# Altium PCB stm_steppers.PcbDoc (part 1 of 2)
Units mil, origin at the board's own origin, x right, y up, seen from the top; angles counter-clockwise.
Board outline 6000 x 4000 mil, 6 copper layers (L1, L2, L3, L4, L5, L6), stack 60.556 mil thick; 99 components, 127 nets, 625 pads, 390 vias.
Unrouted connection lines stored in the file: 29.
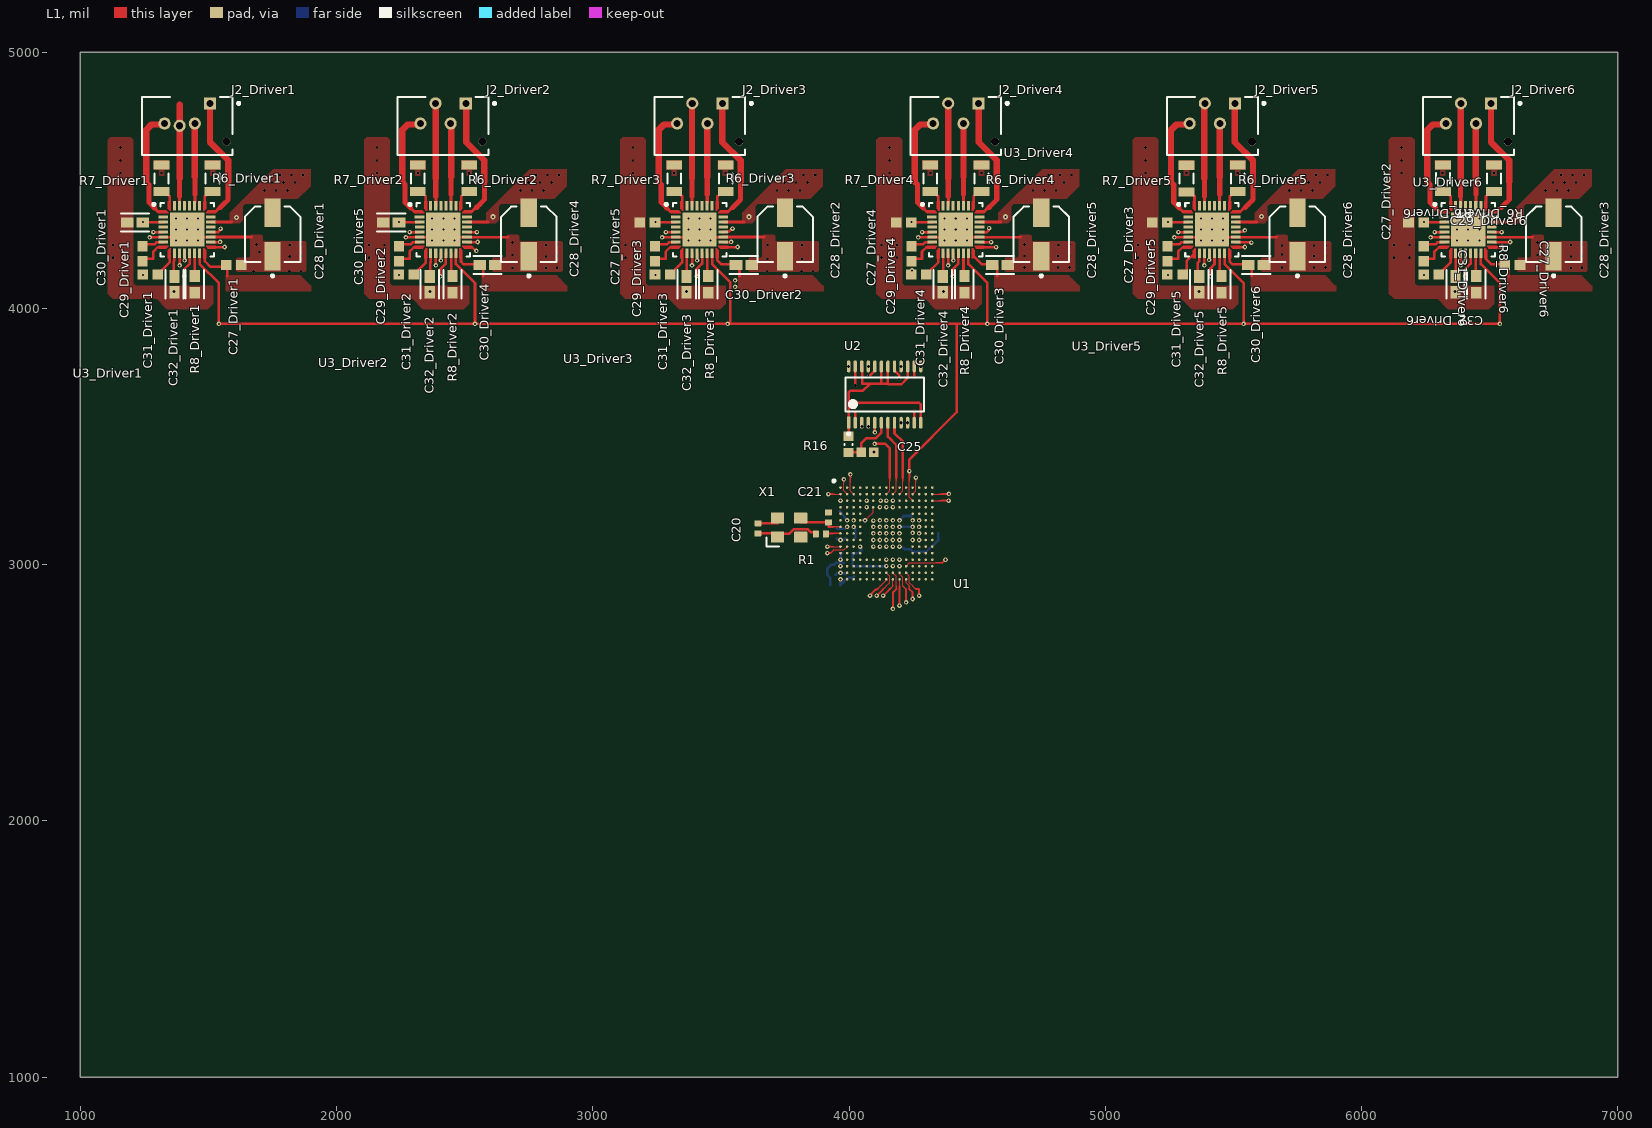
[diagram p0: L1 view]
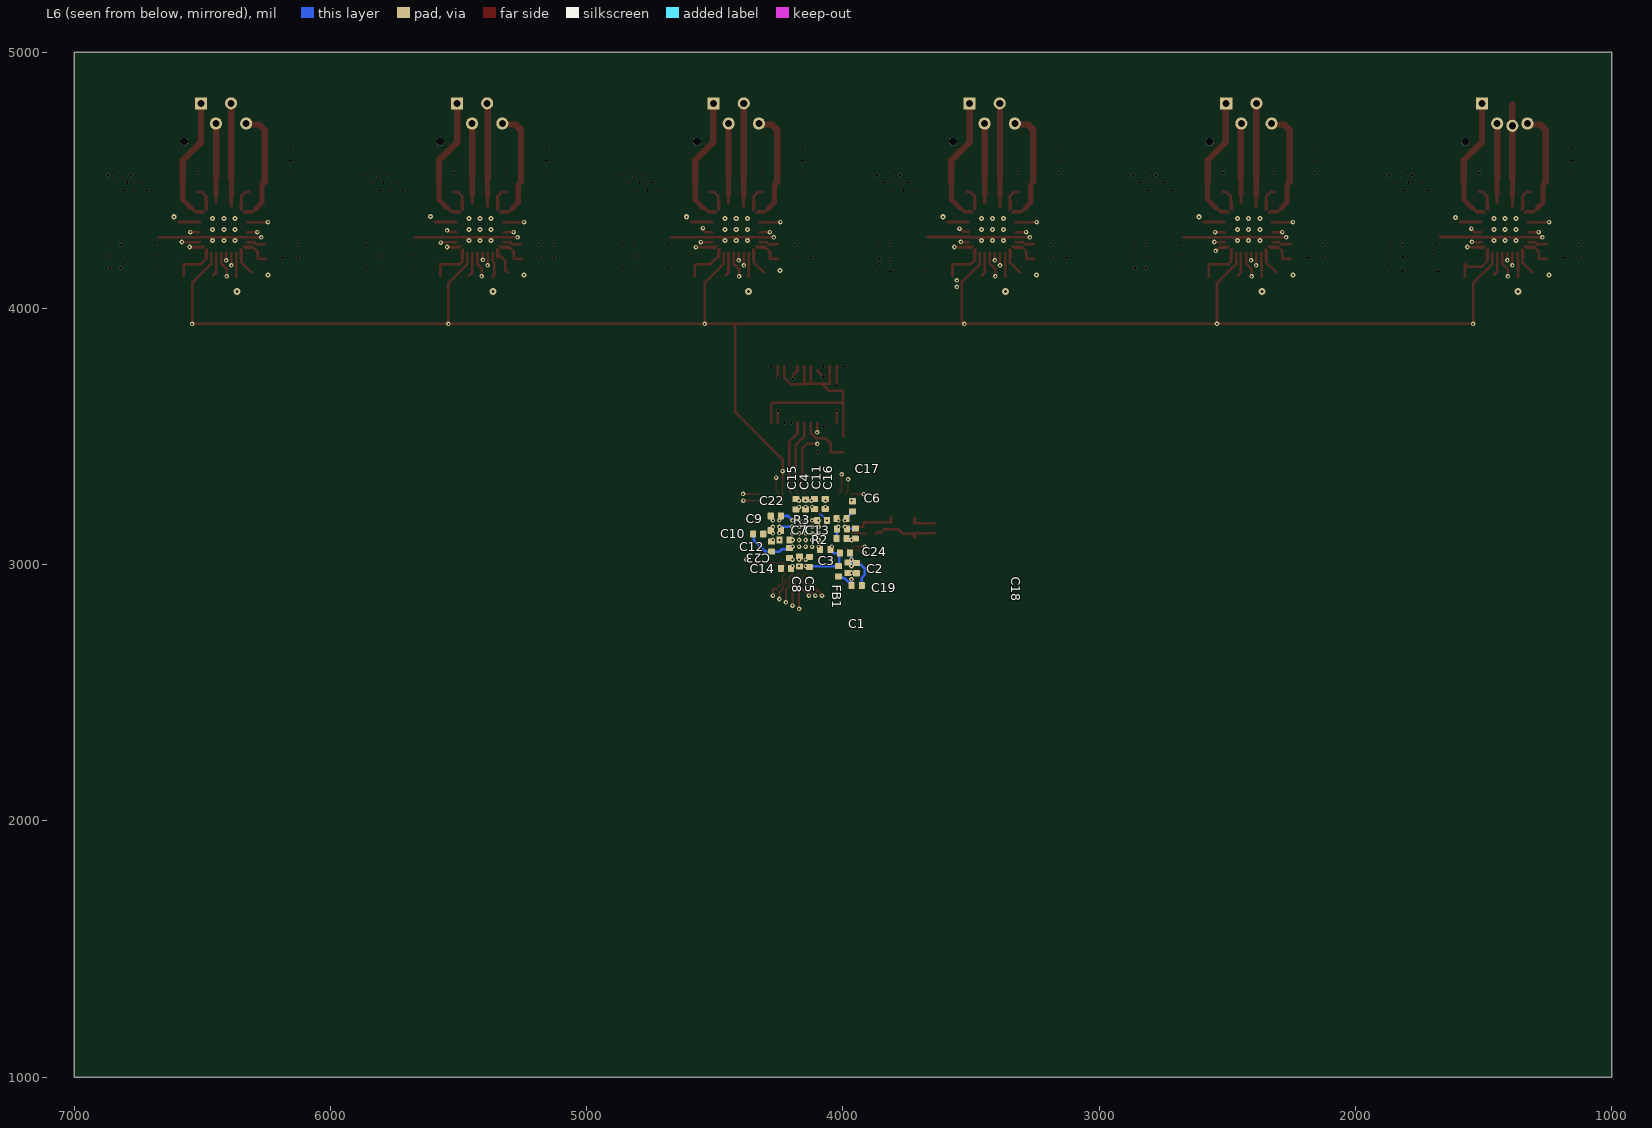
[diagram p1: L6 view, seen from below]
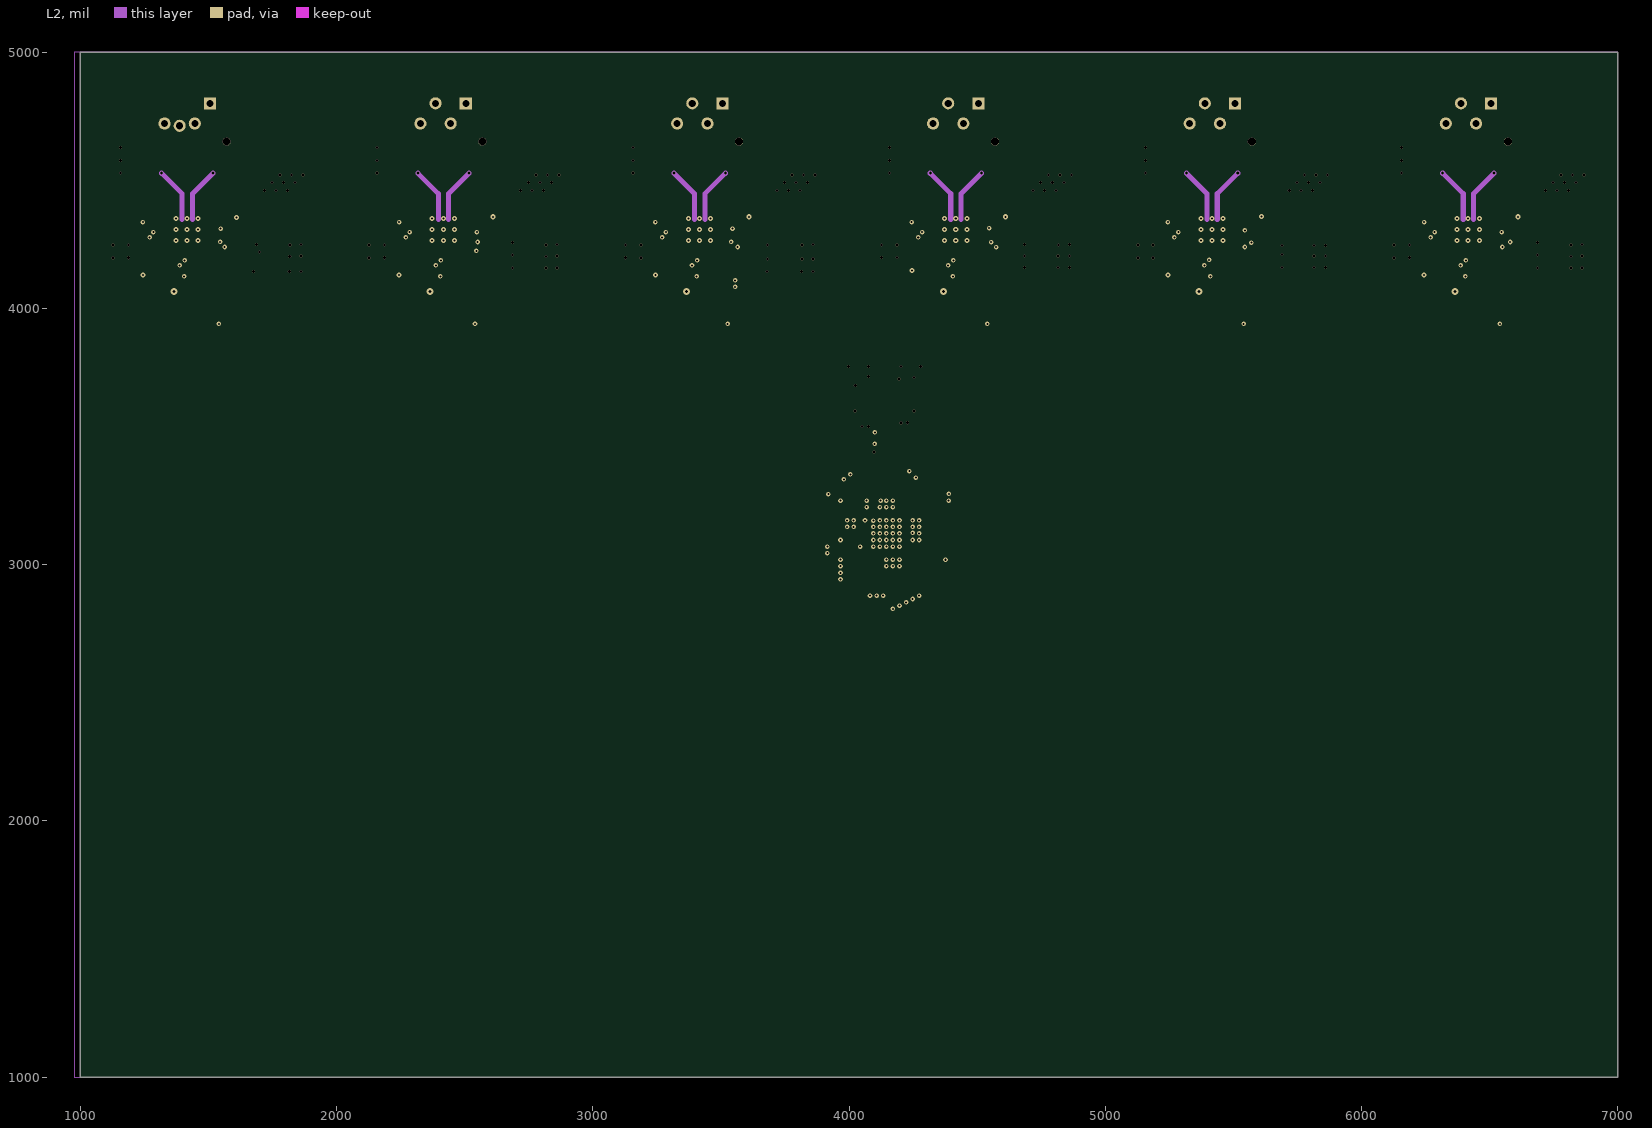
[diagram p2: L2]
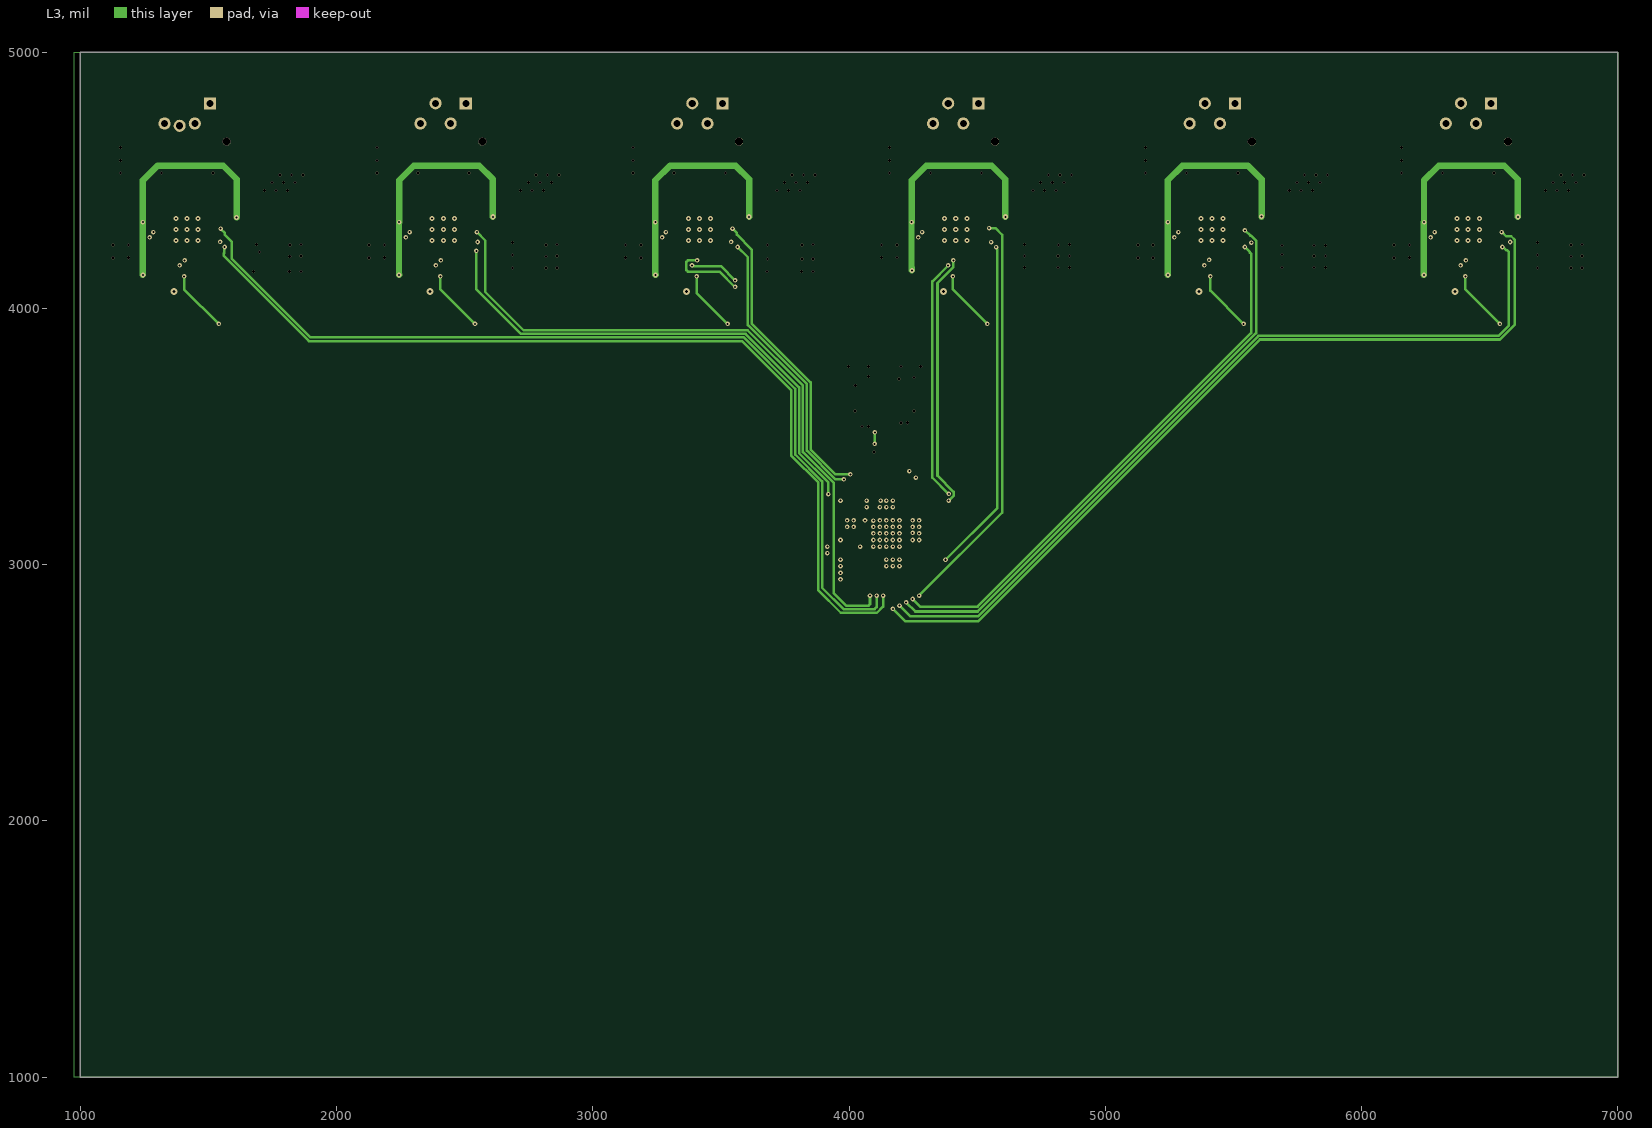
[diagram p3: L3]
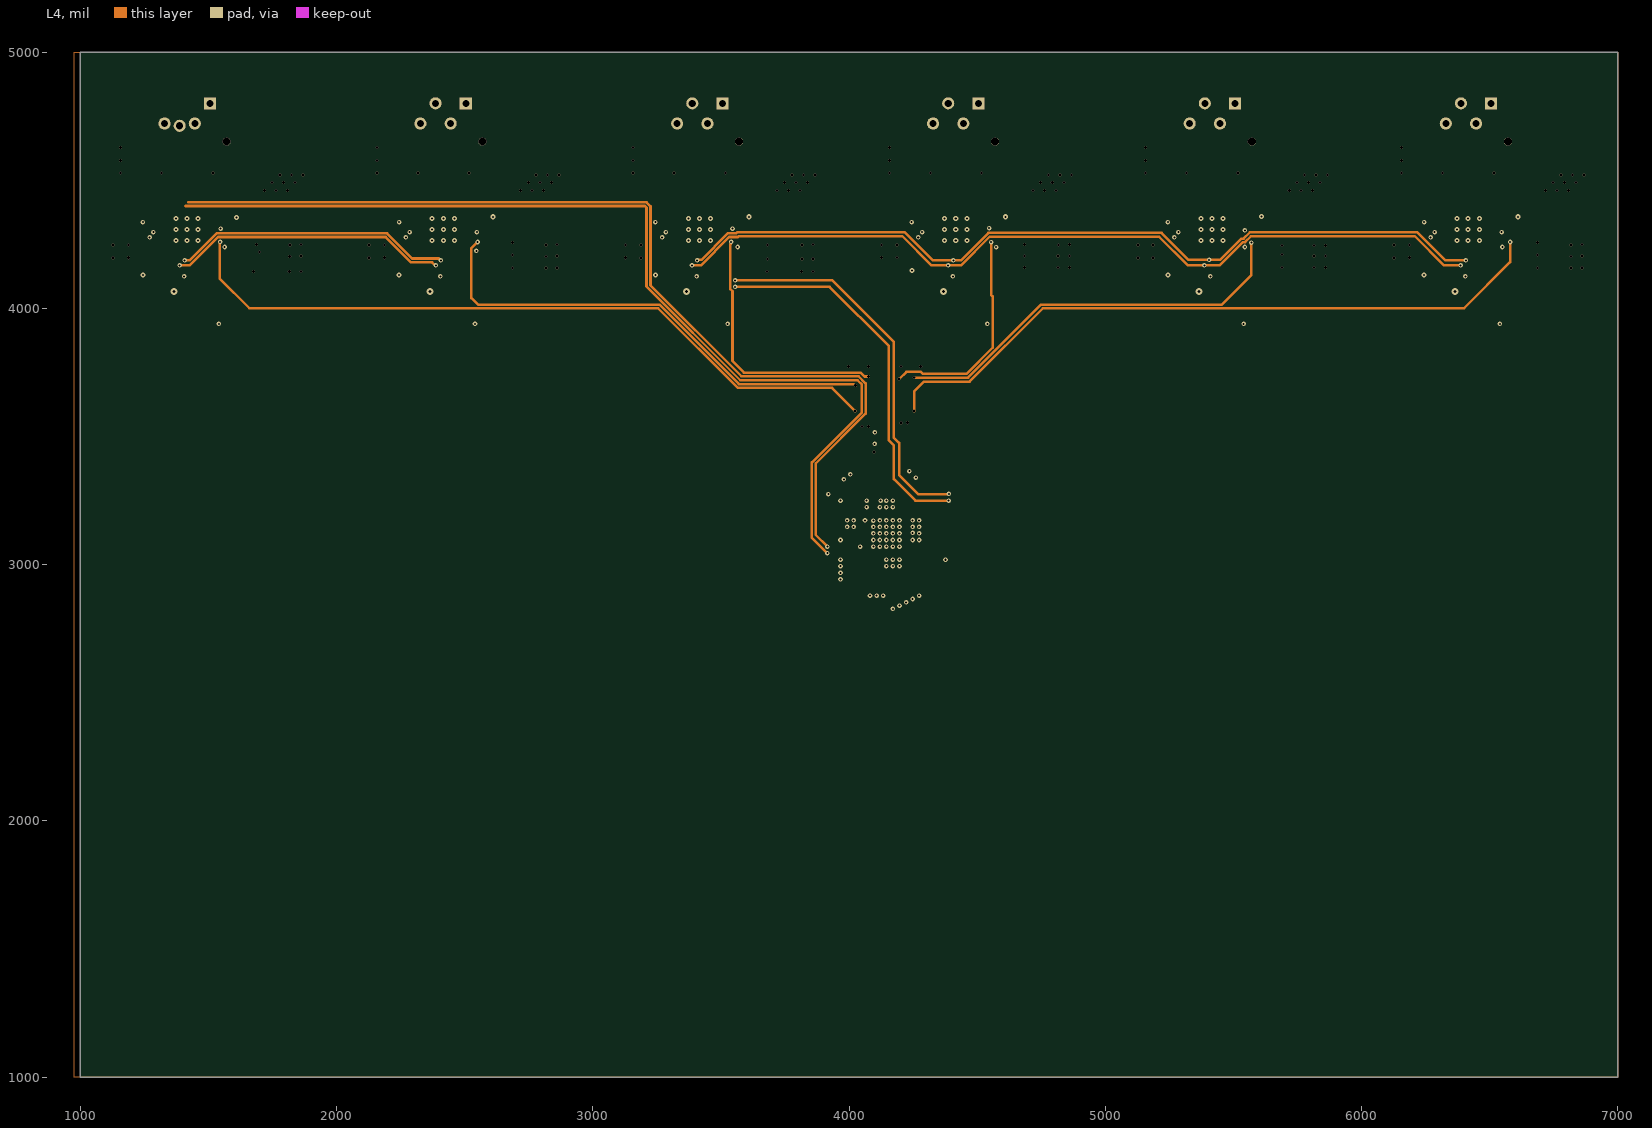
[diagram p4: L4]
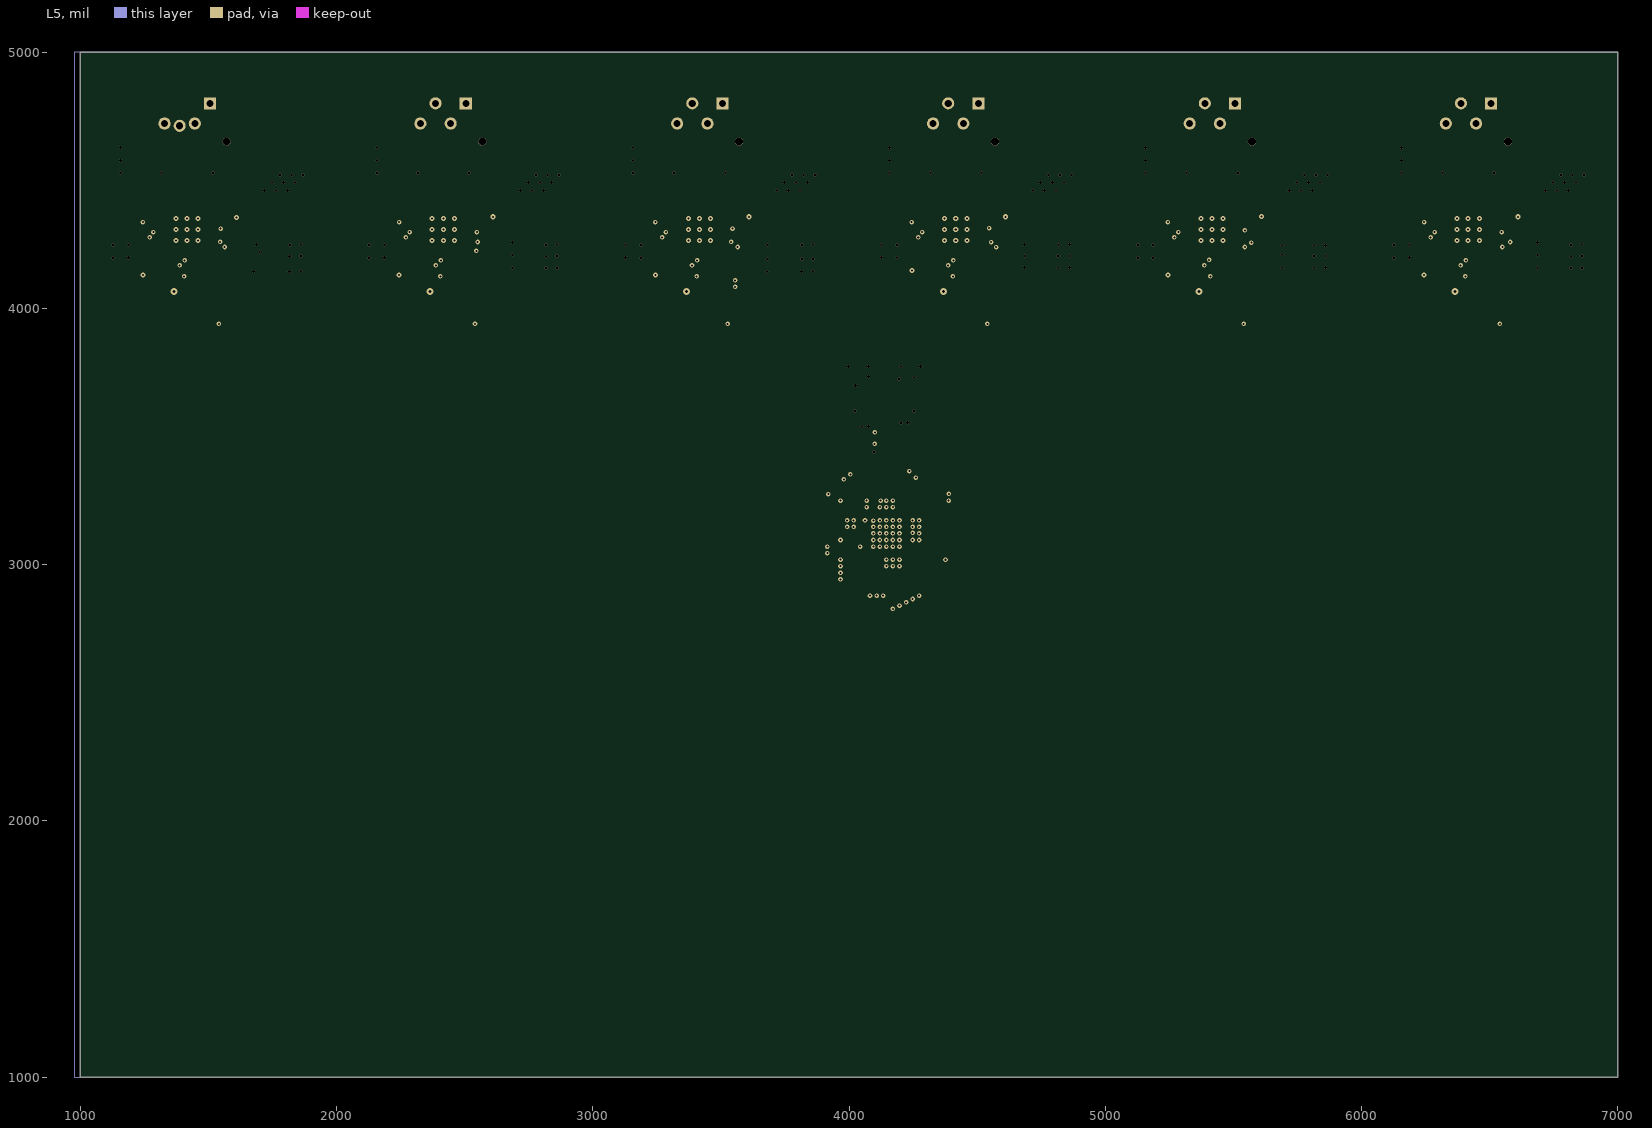
[diagram p5: L5]
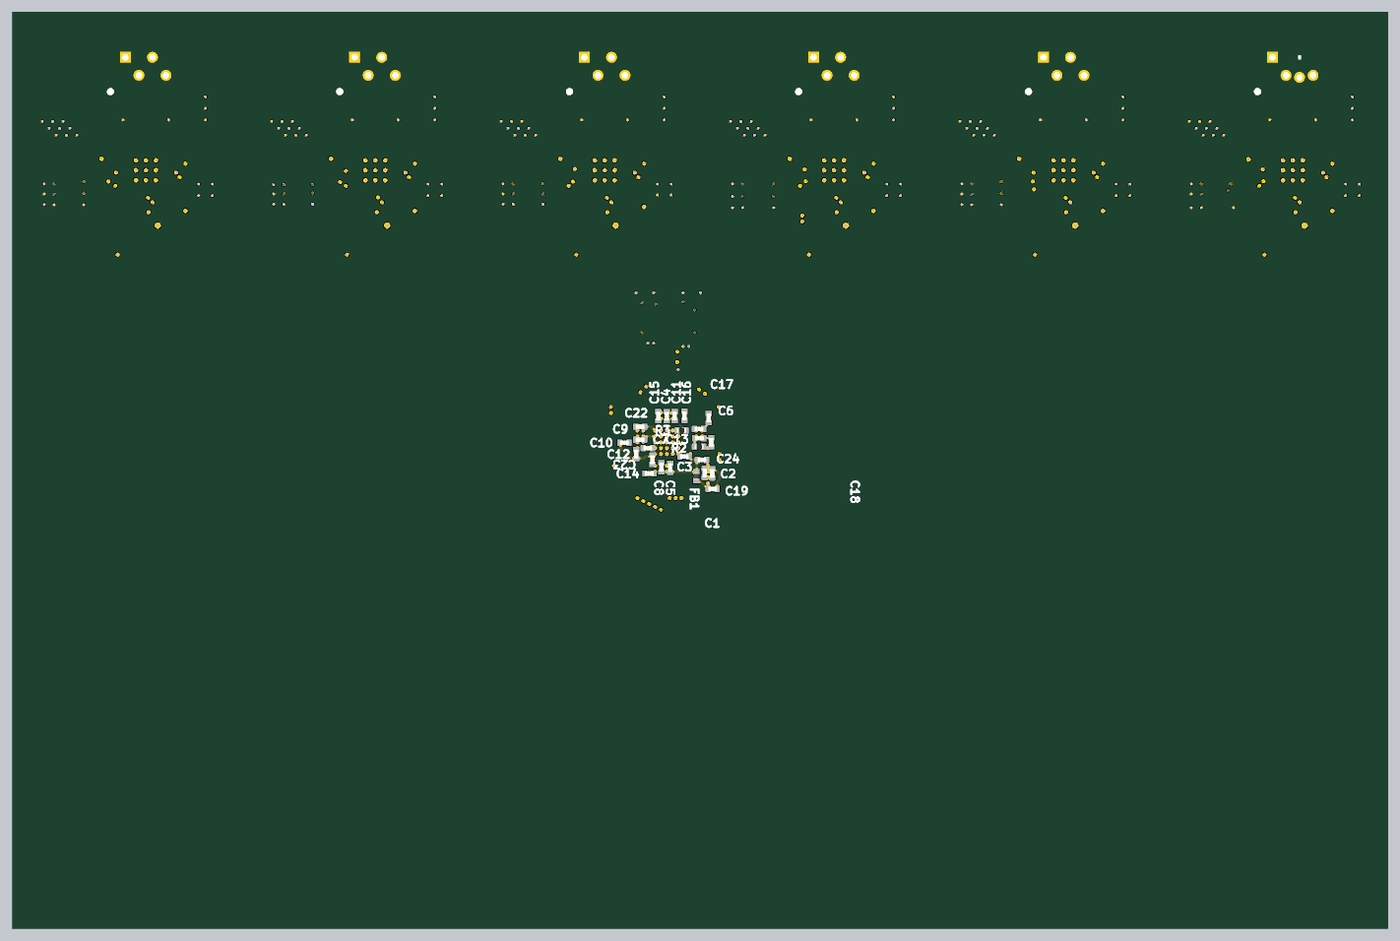
[diagram p7: 3D render of the assembled board from below, using the file's embedded part models]

## Layer stack, top to bottom
Top Solder: solder mask 0.4, Solder Resist, Dk 3.8
L1: signal copper 1.378
Prepreg1: prepreg 3.91, PP-015, Dk 4.1
L2: signal copper 0.6
Core1: core 21.65, Core-037, Dk 4.41
L3: signal copper 0.6
Prepreg2: prepreg 4.28, PP-016, Dk 4.16
L4: signal copper 0.6
Core2: core 21.65, Core-037, Dk 4.41
L5: signal copper 0.6
Prepreg3: prepreg 3.91, PP-015, Dk 4.1
L6: signal copper 1.378
Bottom Solder: solder mask 0.4, Solder Resist, Dk 3.8

## Board outline
1000,1000 7000,1000 7000,5000 1000,5000

## Design rules (kind name [scope] priority, off if disabled: settings)
Clearance [All] p1: gap=4 ignorepadtopadclearanceinfootprint=TRUE except(5: Arc-Via Track-Via SMDPad-Via THPad-Via Via-Via Via-Fill Via-Poly Via-Region; 10: Arc-Text Arc-Hole Track-Text Track-Hole SMDPad-Text SMDPad-Hole THPad-Text THPad-Hole Via-Hole Fill-Text Fill-Hole Poly-Text Poly-Hole Region-Text Region-Hole Text-Text Text-Hole)
FanoutControl Fanout_BGA [IsBGA AND NOT(InNet('+3V3') OR InNet('GND') OR InNet('VDDA') OR InNet('VBAT'))] p1: bgadir=Out bgaviamode=Centered fanoutstyle=Auto fanoutdirection=Alternating viagrid=1 // Fanout_BGA (Default Rule)
PolygonConnect [All] p1: connectstyle=Direct reliefconductorwidth=10 reliefentries=4 polygonreliefangle="90 Angle" airgapwidth=10
RoutingCorners [(InNet('STEP_X') OR InNet('STEP_Y') OR InNet('STEP_Z0')) AND OnLayer('L3')] p1: cornerstyle=45-Degree minsetback=36.22 maxsetback=71.26
RoutingVias [All] p1: holewidth=7.87 width=17.72 viastyle="Through Hole" minholewidth=7.87 minwidth=17.72 maxholewidth=11.81 maxwidth=23.62
SolderMaskExpansion [All] p1: expansion=4 istentingtop=FALSE
SupplyNets "Schematic Supply Nets_2" [InNet('GND')] p1: voltage=0.000
SupplyNets "Schematic Supply Nets_5" [InNet('DPOT_VDD')] p2: voltage=0.000
SupplyNets "Schematic Supply Nets" [InNet('VDD')] p3: voltage=0.000
SupplyNets "Schematic Supply Nets_4" [InNet('MCU_VREF+')] p4: voltage=0.000
Width [All] p1: maxlimit=25 minlimit=3.5 preferedwidth=10
28 further rules are at their usual default settings.

## Classes and differential pairs
net class REF_[1..6]: REF_1 REF_2 REF_3 REF_4 REF_5 REF_6
net class DIR_[1..6]: DIR_1 DIR_2 DIR_3 DIR_4 DIR_5 DIR_6
net class STEP_[1..6]: NetU3_Driver2_17 STEP_1 STEP_5
component class Driver4: C27_Driver4 C28_Driver4 C29_Driver4 C30_Driver4 C31_Driver4 C32_Driver4 J2_Driver4 R6_Driver4 R7_Driver4 R8_Driver4 U3_Driver4
component class Driver3: C27_Driver3 C28_Driver3 C29_Driver3 C30_Driver3 C31_Driver3 C32_Driver3 J2_Driver3 R6_Driver3 R7_Driver3 R8_Driver3 U3_Driver3
component class Driver2: C27_Driver2 C28_Driver2 C29_Driver2 C30_Driver2 C31_Driver2 C32_Driver2 J2_Driver2 R6_Driver2 R7_Driver2 R8_Driver2 U3_Driver2
component class Driver1: C27_Driver1 C28_Driver1 C29_Driver1 C30_Driver1 C31_Driver1 C32_Driver1 J2_Driver1 R6_Driver1 R7_Driver1 R8_Driver1 U3_Driver1
channel class Driver: Driver1 Driver2 Driver3 Driver4 Driver5 Driver6
component class Driver5: C27_Driver5 C28_Driver5 C29_Driver5 C30_Driver5 C31_Driver5 C32_Driver5 J2_Driver5 R6_Driver5 R7_Driver5 R8_Driver5 U3_Driver5
component class Driver6: C27_Driver6 C28_Driver6 C29_Driver6 C30_Driver6 C31_Driver6 C32_Driver6 J2_Driver6 R6_Driver6 R7_Driver6 R8_Driver6 U3_Driver6
component class Sheet1: C1 C2 C3 C4 C5 C6 C7 C8 C9 C10 C11 C12 C13 C14 C15 C16 C17 C18 C19 C20 C21 C22 C23 C24 C25 FB1 R1 R2 R3 R16 U1 U2 X1

## Components (designator, comment, footprint, x,y, rotation, side; value= is the part's Value field where it differs from the comment)
C1 "1u" CAP_0402 3980.95,2988.17 r270 bottom
C2 "10n" CAP_0402 3947.44,2986.3 r270 bottom
C3 "4.7u" CAP_0402 3992.13,3045.28 r0 bottom
C4 "100n" CAP_0402 4146,3235.68 r90 bottom
C5 "100n" CAP_0402 4131,3011 r270 bottom
C6 "100n" CAP_0402 3963,3228 r90 bottom
C7 "100n" CAP_0402 4228.35,3096.46 r0 bottom
C8 "100n" CAP_0402 4169.29,3012.99 r270 bottom
C9 "100n" CAP_0402 4262,3133.78 r0 bottom
C10 "100n" CAP_0402 4330.69,3120 r180 bottom
C11 "100n" CAP_0402 4111,3236.31 r90 bottom
C12 "100n" CAP_0402 4279,3070.68 r90 bottom
C13 "100n" CAP_0402 4004,3140 r0 bottom
C14 "100n" CAP_0402 4221.69,2986 r180 bottom
C15 "100n" CAP_0402 4183,3236 r90 bottom
C16 "100n" CAP_0402 4069,3237 r90 bottom
C17 "100n" CAP_0402 4005,3180 r0 bottom
C18 "100n" CAP_0402 4069,3060 r180 bottom
C19 "C0402" CAP_0402 3946,2919 r0 bottom
C20 "10p" CAP_0402 3644,3142 r270 top
C21 "10p" CAP_0402 3919.35,3184.79 r270 top
C22 "2.2u" CAP_0402 4262,3190 r0 bottom
C23 "2.2u" CAP_0402 4209,3046 r270 bottom
C24 "100n" CAP_0402 3951.57,3122.05 r270 bottom
C25 "Capacitor 100 nF +/-10% 50 V 0603" CAPC1608X90X40NL10T20 4072,3439 r180 top value=100nF
C27_Driver1 ".1uF" CAPC1608X90X35NL15T15 1598,4170 r0 top (schematic designator C27)
C27_Driver2 ".1uF" CAPC1608X90X35NL15T15 6213,4336 r180 top (schematic designator C27)
C27_Driver3 ".1uF" CAPC1608X90X35NL15T15 5213,4336 r180 top (schematic designator C27)
C27_Driver4 ".1uF" CAPC1608X90X35NL15T15 4213,4336 r180 top (schematic designator C27)
C27_Driver5 ".1uF" CAPC1608X90X35NL15T15 3213,4336 r180 top (schematic designator C27)
C27_Driver6 ".1uF" CAPC1608X90X35NL15T15 6589,4170 r0 top (schematic designator C27)
C28_Driver1 "EEEFT1C101AR" FP-FTC-MFG 1750,4289 r90 top (schematic designator C28)
C28_Driver2 "EEEFT1C101AR" FP-FTC-MFG 3750,4289 r90 top (schematic designator C28)
C28_Driver3 "EEEFT1C101AR" FP-FTC-MFG 6750,4289 r90 top (schematic designator C28)
C28_Driver4 "EEEFT1C101AR" FP-FTC-MFG 2750,4289 r90 top (schematic designator C28)
C28_Driver5 "EEEFT1C101AR" FP-FTC-MFG 4750,4289 r90 top (schematic designator C28)
C28_Driver6 "EEEFT1C101AR" FP-FTC-MFG 5750,4289 r90 top (schematic designator C28)
C29_Driver1 ".1uF" CAPC1608X90X35NL15T15 1243,4214 r90 top (schematic designator C29)
C29_Driver2 ".1uF" CAPC1608X90X35NL15T15 2243,4214 r90 top (schematic designator C29)
C29_Driver3 ".1uF" CAPC1608X90X35NL15T15 3243,4214 r90 top (schematic designator C29)
C29_Driver4 ".1uF" CAPC1608X90X35NL15T15 4243,4214 r90 top (schematic designator C29)
C29_Driver5 ".1uF" CAPC1608X90X35NL15T15 5243,4214 r90 top (schematic designator C29)
C29_Driver6 ".1uF" CAPC1608X90X35NL15T15 6243,4214 r90 top (schematic designator C29)
C30_Driver1 "UMK107B7224KA-TR" FP-0603-L_1_6_0_1-W_0_8_0-IPC_A 1213,4336 r180 top (schematic designator C30)
C30_Driver2 "UMK107B7224KA-TR" FP-0603-L_1_6_0_1-W_0_8_0-IPC_A 3589,4170 r0 top (schematic designator C30)
C30_Driver3 "UMK107B7224KA-TR" FP-0603-L_1_6_0_1-W_0_8_0-IPC_A 4589,4170 r0 top (schematic designator C30)
C30_Driver4 "UMK107B7224KA-TR" FP-0603-L_1_6_0_1-W_0_8_0-IPC_A 2589,4170 r0 top (schematic designator C30)
C30_Driver5 "UMK107B7224KA-TR" FP-0603-L_1_6_0_1-W_0_8_0-IPC_A 2213,4336 r180 top (schematic designator C30)
C30_Driver6 "UMK107B7224KA-TR" FP-0603-L_1_6_0_1-W_0_8_0-IPC_A 5589,4170 r0 top (schematic designator C30)
C31_Driver1 ".1uF" CAPC1608X90X35NL15T15 1272,4133 r0 top (schematic designator C31)
C31_Driver2 ".1uF" CAPC1608X90X35NL15T15 2272,4133 r0 top (schematic designator C31)
C31_Driver3 ".1uF" CAPC1608X90X35NL15T15 3272,4133 r0 top (schematic designator C31)
C31_Driver4 ".1uF" CAPC1608X90X35NL15T15 4272,4133 r0 top (schematic designator C31)
C31_Driver5 ".1uF" CAPC1608X90X35NL15T15 5272,4133 r0 top (schematic designator C31)
C31_Driver6 ".1uF" CAPC1608X90X35NL15T15 6272,4133 r0 top (schematic designator C31)
C32_Driver1 ".22uF" FP-0603-L_1_6_0_1-W_0_8_0-IPC_A 1367,4094 r270 top (schematic designator C32)
C32_Driver2 ".22uF" FP-0603-L_1_6_0_1-W_0_8_0-IPC_A 2363,4094 r270 top (schematic designator C32)
C32_Driver3 ".22uF" FP-0603-L_1_6_0_1-W_0_8_0-IPC_A 3366,4094 r270 top (schematic designator C32)
C32_Driver4 ".22uF" FP-0603-L_1_6_0_1-W_0_8_0-IPC_A 4366,4094 r270 top (schematic designator C32)
C32_Driver5 ".22uF" FP-0603-L_1_6_0_1-W_0_8_0-IPC_A 5366.92,4094 r270 top (schematic designator C32)
C32_Driver6 ".22uF" FP-0603-L_1_6_0_1-W_0_8_0-IPC_A 6367,4094 r270 top (schematic designator C32)
FB1 "FB0402" FB_0402 4017.72,2974.41 r270 bottom
J2_Driver1 "B04B-ZESK-1D(T)(LF)(SN)(N)" FP-B04B-ZESK-1D_T_LF_SN-MFG#1 1416.85,4713.14 r0 top (schematic designator J2)
J2_Driver2 "B04B-ZESK-1D(T)(LF)(SN)(N)" FP-B04B-ZESK-1D_T_LF_SN-MFG#2 2415.47,4713.14 r0 top (schematic designator J2)
J2_Driver3 "B04B-ZESK-1D(T)(LF)(SN)(N)" FP-B04B-ZESK-1D_T_LF_SN-MFG#2 3417.53,4713.14 r0 top (schematic designator J2)
J2_Driver4 "B04B-ZESK-1D(T)(LF)(SN)(N)" FP-B04B-ZESK-1D_T_LF_SN-MFG#2 4416.53,4713.14 r0 top (schematic designator J2)
J2_Driver5 "B04B-ZESK-1D(T)(LF)(SN)(N)" FP-B04B-ZESK-1D_T_LF_SN-MFG#2 5418,4713.14 r0 top (schematic designator J2)
J2_Driver6 "B04B-ZESK-1D(T)(LF)(SN)(N)" FP-B04B-ZESK-1D_T_LF_SN-MFG#2 6417.53,4713.14 r0 top (schematic designator J2)
R1 "0R" RES_0402 3889.76,3120.36 r0 top
R2 "10K" RES_0402 4005,3103 r180 bottom
R3 "10K" RES_0402 4081.69,3173.23 r0 bottom
R6_Driver1 "ERJ8BWFR075V" RESC3216X70X50LL05T20 1515.38,4508 r270 top (schematic designator R6)
R6_Driver2 "ERJ8BWFR075V" RESC3216X70X50LL05T20 2518,4508 r270 top (schematic designator R6)
R6_Driver3 "ERJ8BWFR075V" RESC3216X70X50LL05T20 3518,4508 r270 top (schematic designator R6)
R6_Driver4 "ERJ8BWFR075V" RESC3216X70X50LL05T20 4517,4508 r270 top (schematic designator R6)
R6_Driver5 "ERJ8BWFR075V" RESC3216X70X50LL05T20 5517,4508 r270 top (schematic designator R6)
R6_Driver6 "ERJ8BWFR075V" RESC3216X70X50LL05T20 6517,4508 r270 top (schematic designator R6)
R7_Driver1 ".075" RESC3216X70X50LL05T20 1316.38,4508 r270 top (schematic designator R7)
R7_Driver2 ".075" RESC3216X70X50LL05T20 2316,4508 r270 top (schematic designator R7)
R7_Driver3 ".075" RESC3216X70X50LL05T20 3317,4508 r270 top (schematic designator R7)
R7_Driver4 ".075" RESC3216X70X50LL05T20 4317,4508 r270 top (schematic designator R7)
R7_Driver5 ".075" RESC3216X70X50LL05T20 5317,4507 r270 top (schematic designator R7)
R7_Driver6 ".075" RESC3216X70X50LL05T20 6318,4508.17 r270 top (schematic designator R7)
R8_Driver1 "25K" FP-MCR03-IPC_A 1446,4094 r270 top (schematic designator R8)
R8_Driver2 "25K" FP-MCR03-IPC_A 2452,4094 r270 top (schematic designator R8)
R8_Driver3 "25K" FP-MCR03-IPC_A 3450,4094 r270 top (schematic designator R8)
R8_Driver4 "25K" FP-MCR03-IPC_A 4450,4094 r270 top (schematic designator R8)
R8_Driver5 "25K" FP-MCR03-IPC_A 5453,4094 r270 top (schematic designator R8)
R8_Driver6 "25K" FP-MCR03-IPC_A 6448,4094 r270 top (schematic designator R8)
R16 "3K3 5% 0603(1608)" RESC0603(1608)_N 3998,3470 r90 top value="3300.00 Ohm"
U1 "STM32F407IGH6TR" STM-UFBGA176+25_A_V 4145.67,3122.05 r0 top locked
U2 "AD5206BRUZ100-RL7" FP-RU-24-IPC_C 4139,3664 r90 top
U3_Driver1 "A4982_QFN-32_5x5_Pitch0.5mm" QFN50P500X500X80_HS-33N 1416.38,4308 r0 top (schematic designator U3)
U3_Driver2 "A4982_QFN-32_5x5_Pitch0.5mm" QFN50P500X500X80_HS-33N 2416.38,4308 r0 top (schematic designator U3)
U3_Driver3 "A4982_QFN-32_5x5_Pitch0.5mm" QFN50P500X500X80_HS-33N 3416.38,4308 r0 top (schematic designator U3)
U3_Driver4 "A4982_QFN-32_5x5_Pitch0.5mm" QFN50P500X500X80_HS-33N 4416.38,4308 r0 top (schematic designator U3)
U3_Driver5 "A4982_QFN-32_5x5_Pitch0.5mm" QFN50P500X500X80_HS-33N 5416.38,4308 r0 top (schematic designator U3)
U3_Driver6 "A4982_QFN-32_5x5_Pitch0.5mm" QFN50P500X500X80_HS-33N 6416.38,4308 r0 top (schematic designator U3)
X1 "24MHz" XTAL_3225 3766,3145 r0 top

## Footprints (in the part's own frame and the unit in brackets; to place one, negate y for a bottom-side part, rotate by r counter-clockwise, add the part's x,y. Pads: shape width x height; smd on the part's side, far side on the other; paste and mask are expansions set on the pad)
CAP_0402 [mm]
  rrect25% 0.6x0.7 smd: 1(-0.5,0) 2(0.5,0)
  body extent -0.5,-0.26 0.5,0.27, height 0.37
CAPC1608X90X35NL15T15 [mm] "Chip Capacitor, 2-Leads, Body 1.60x0.81mm, IPC Medium Density"
  rect 1.05x1 smd: 1(-0.75,0) 2(0.75,0)
  body extent -0.88,-0.48 0.87,0.48, height 0.9
CAPC1608X90X40NL10T20 [mm] "Chip Capacitor, 2-Leads, Body 1.70x0.90mm, IPC Medium Density"
  rect 0.95x0.95 smd: 1(-0.625,0) 2(0.625,0)
  body extent -0.85,-0.45 0.85,0.45, height 0.9
FB_0402 [mm]
  rrect25% 0.6x0.7 smd: 1(-0.5,0) 2(0.5,0)
  body extent -0.5,-0.25 0.5,0.25, height 0.51
FP-0603-L_1_6_0_1-W_0_8_0-IPC_A [mil]
  rect 49.52x39.85 smd paste+0 mask+0: 1(-30.6,0) 2(30.6,0)
  silkscreen extent -55,-36 55,36, body extent -75,-40 75,40, height 10
FP-B04B-ZESK-1D_T_LF_SN-MFG#1 [mm]
  rect 1.2x1.2 hole 0.7 paste-2539.97 mask+0: 1(2.25,2.225)
  round 1.2 hole 0.7 paste-2539.97 mask+0: 2(0.75,0.225) 3(-0.75,0) 4(-2.25,0.225)
  round 0.8 hole 0.8 unplated paste-2539.97 mask+0: ""(3.9,-1.575)
  silkscreen extent -4.5,-2.88 5.23,2.88, body extent -4.6,-2.98 4.6,2.98, height 0.25
FP-B04B-ZESK-1D_T_LF_SN-MFG#2 [mm]
  rect 1.2x1.2 hole 0.7 paste-2539.97 mask+0: 1(2.25,2.225)
  round 1.2 hole 0.7 paste-2539.97 mask+0: 2(0.75,0.225) 3(-0.75,2.225) 4(-2.25,0.225)
  round 0.8 hole 0.8 unplated paste-2539.97 mask+0: ""(3.9,-1.575)
  silkscreen extent -4.5,-2.88 5.23,2.88, body extent -4.6,-2.98 4.6,2.98, height 0.25
FP-FTC-MFG [mm]
  rect 2.8x1.6 smd paste+0 mask+0: 1(-2.15,0) 2(2.15,0)
  silkscreen extent -4.22,-2.75 2.75,2.75, body extent -3.8,-3 3.8,3, height 0.25
FP-MCR03-IPC_A [mil]
  rect 45.6x39.85 smd paste+0 mask+0: 1(-32.56,0) 2(32.56,0)
  silkscreen extent -55,-36 55,36, body extent -75,-40 75,40, height 10
FP-RU-24-IPC_C [mm]
  rect 1.188x0.341 smd paste+0 mask+0: 1(-2.791,3.575)
  rrect100% 1.188x0.341 smd paste+0 mask+0: 2(-2.791,2.925) 3(-2.791,2.275) 4(-2.791,1.625) 5(-2.791,0.975) 6(-2.791,0.325) 7(-2.791,-0.325) 8(-2.791,-0.975) 9(-2.791,-1.625) 10(-2.791,-2.275) 11(-2.791,-2.925) 12(-2.791,-3.575) 13(2.791,-3.575) 14(2.791,-2.925) 15(2.791,-2.275) 16(2.791,-1.625) 17(2.791,-0.975) 18(2.791,-0.325) 19(2.791,0.325) 20(2.791,0.975) 21(2.791,1.625) 22(2.791,2.275) 23(2.791,2.925) 24(2.791,3.575)
  silkscreen extent -4.01,-3.9 1.7,3.9, body extent -3.49,-4 3.49,4, height 0.25
QFN50P500X500X80_HS-33N [mm] "QFN, 32-Leads, Body 5.00x5.00mm, Pitch 0.50mm, Thermal Pad 3.40x3.40mm, IPC Medium Density"
  round 0.025 smd paste-2539.97: 1(-2.362,1.75) 8(-2.35,-1.75) 9(-1.75,-2.35) 16(1.75,-2.35) 17(2.35,-1.75) 24(2.35,1.75) 25(1.75,2.35) 32(-1.75,2.35)
  rect 0.95x0.3 smd: 2(-2.362,1.245) 3(-2.35,0.75) 4(-2.35,0.25) 5(-2.35,-0.25) 6(-2.35,-0.75) 7(-2.35,-1.25) 18(2.35,-1.25) 19(2.35,-0.75) 20(2.35,-0.25) 21(2.35,0.25) 22(2.35,0.75) 23(2.35,1.25)
  rect 0.3x0.95 smd: 10(-1.25,-2.35) 11(-0.75,-2.35) 12(-0.25,-2.35) 13(0.25,-2.35) 14(0.75,-2.35) 15(1.25,-2.35) 26(1.25,2.35) 27(0.75,2.35) 28(0.25,2.35) 29(-0.25,2.35) 30(-0.75,2.35) 31(-1.25,2.35)
  rect 3.4x3.4 smd: 33(0,0)
  silkscreen extent -3.42,-2.65 2.65,2.65, body extent -2.5,-2.5 2.5,2.5, height 0.8
RES_0402 [mm]
  rrect25% 0.6x0.7 smd: 1(-0.5,0) 2(0.5,0)
  body extent -0.5,-0.25 0.5,0.25, height 0.3
RESC0603(1608)_N [mm] "Chip Resistor, Body 1.6x0.8mm, IPC Medium Density"
  rect 0.9x1 smd: 1(-0.8,0) 2(0.8,0)
  silkscreen extent -0.05,-0.4 0.05,0.4, body extent -0.85,-0.47 0.85,0.47, height 0.6
RESC3216X70X50LL05T20 [mm] "Chip Resistor, 2-Leads, Body 3.20x1.60mm, IPC High Density"
  rect 0.9x1.55 smd: 1(-1.325,0) 2(1.325,0)
  silkscreen extent -0.5,-0.67 0.5,0.67, body extent -1.63,-0.82 1.62,0.82, height 0.7
STM-UFBGA176+25_A_V [mm] "BGA, 201-Balls, Body 10x10mm, Pitch 0.65mm"
  round 0.25 smd: A1(-4.55,4.55) A2(-3.9,4.55) A3(-3.25,4.55) A4(-2.6,4.55) A5(-1.95,4.55) A6(-1.3,4.55) A7(-0.65,4.55) A8(0,4.55) A9(0.65,4.55) A10(1.3,4.55) A11(1.95,4.55) A12(2.6,4.55) A13(3.25,4.55) A14(3.9,4.55) A15(4.55,4.55) B1(-4.55,3.9) B2(-3.9,3.9) B3(-3.25,3.9) B4(-2.6,3.9) B5(-1.95,3.9) B6(-1.3,3.9) B7(-0.65,3.9) B8(0,3.9) B9(0.65,3.9) B10(1.3,3.9) B11(1.95,3.9) B12(2.6,3.9) B13(3.25,3.9) B14(3.9,3.9) B15(4.55,3.9) C1(-4.55,3.25) C2(-3.9,3.25) C3(-3.25,3.25) C4(-2.6,3.25) C5(-1.95,3.25) C6(-1.3,3.25) C7(-0.65,3.25) C8(0,3.25) C9(0.65,3.25) C10(1.3,3.25) C11(1.95,3.25) C12(2.6,3.25) C13(3.25,3.25) C14(3.9,3.25) C15(4.55,3.25) D1(-4.55,2.6) D2(-3.9,2.6) D3(-3.25,2.6) D4(-2.6,2.6) D5(-1.95,2.6) D6(-1.3,2.6) D7(-0.65,2.6) D8(0,2.6) D9(0.65,2.6) D10(1.3,2.6) D11(1.95,2.6) D12(2.6,2.6) D13(3.25,2.6) D14(3.9,2.6) D15(4.55,2.6) E1(-4.55,1.95) E2(-3.9,1.95) E3(-3.25,1.95) E4(-2.6,1.95) E12(2.6,1.95) E13(3.25,1.95) E14(3.9,1.95) E15(4.55,1.95) F1(-4.55,1.3) F2(-3.9,1.3) F3(-3.25,1.3) F4(-2.6,1.3) F6(-1.3,1.3) F7(-0.65,1.3) F8(0,1.3) F9(0.65,1.3) F10(1.3,1.3) F12(2.6,1.3) F13(3.25,1.3) F14(3.9,1.3) F15(4.55,1.3) G1(-4.55,0.65) G2(-3.9,0.65) G3(-3.25,0.65) G4(-2.6,0.65) G6(-1.3,0.65) G7(-0.65,0.65) G8(0,0.65) G9(0.65,0.65) G10(1.3,0.65) G12(2.6,0.65) G13(3.25,0.65) G14(3.9,0.65) G15(4.55,0.65) H1(-4.55,0) H2(-3.9,0) H3(-3.25,0) H4(-2.6,0) H6(-1.3,0) H7(-0.65,0) H8(0,0) H9(0.65,0) H10(1.3,0) H12(2.6,0) H13(3.25,0) H14(3.9,0) H15(4.55,0) J1(-4.55,-0.65) J2(-3.9,-0.65) J3(-3.25,-0.65) J4(-2.6,-0.65) J6(-1.3,-0.65) J7(-0.65,-0.65) J8(0,-0.65) J9(0.65,-0.65) J10(1.3,-0.65) J12(2.6,-0.65) J13(3.25,-0.65) J14(3.9,-0.65) J15(4.55,-0.65) K1(-4.55,-1.3) K2(-3.9,-1.3) K3(-3.25,-1.3) K4(-2.6,-1.3) K6(-1.3,-1.3) K7(-0.65,-1.3) K8(0,-1.3) K9(0.65,-1.3) K10(1.3,-1.3) K12(2.6,-1.3) K13(3.25,-1.3) K14(3.9,-1.3) K15(4.55,-1.3) L1(-4.55,-1.95) L2(-3.9,-1.95) L3(-3.25,-1.95) L4(-2.6,-1.95) L12(2.6,-1.95) L13(3.25,-1.95) L14(3.9,-1.95) L15(4.55,-1.95) M1(-4.55,-2.6) M2(-3.9,-2.6) M3(-3.25,-2.6) M4(-2.6,-2.6) M5(-1.95,-2.6) M6(-1.3,-2.6) M7(-0.65,-2.6) M8(0,-2.6) M9(0.65,-2.6) M10(1.3,-2.6) M11(1.95,-2.6) M12(2.6,-2.6) M13(3.25,-2.6) M14(3.9,-2.6) M15(4.55,-2.6) N1(-4.55,-3.25) N2(-3.9,-3.25) N3(-3.25,-3.25) N4(-2.6,-3.25) N5(-1.95,-3.25) N6(-1.3,-3.25) N7(-0.65,-3.25) N8(0,-3.25) N9(0.65,-3.25) N10(1.3,-3.25) N11(1.95,-3.25) N12(2.6,-3.25) N13(3.25,-3.25) N14(3.9,-3.25) N15(4.55,-3.25) P1(-4.55,-3.9) P2(-3.9,-3.9) P3(-3.25,-3.9) P4(-2.6,-3.9) P5(-1.95,-3.9) P6(-1.3,-3.9) P7(-0.65,-3.9) P8(0,-3.9) P9(0.65,-3.9) P10(1.3,-3.9) P11(1.95,-3.9) P12(2.6,-3.9) P13(3.25,-3.9) P14(3.9,-3.9) P15(4.55,-3.9) R1(-4.55,-4.55) R2(-3.9,-4.55) R3(-3.25,-4.55) R4(-2.6,-4.55) R5(-1.95,-4.55) R6(-1.3,-4.55) R7(-0.65,-4.55) R8(0,-4.55) R9(0.65,-4.55) R10(1.3,-4.55) R11(1.95,-4.55) R12(2.6,-4.55) R13(3.25,-4.55) R14(3.9,-4.55) R15(4.55,-4.55)
  silkscreen extent -5.33,5.09 -5.09,5.33, body extent -5,-5 5,5, height 0.6
XTAL_3225 [mm]
  rrect10% 1.3x1.1 smd: 1(-1.15,-0.95) 2(1.15,-0.95) 3(1.15,0.95) 4(-1.15,0.95)
  silkscreen extent -2.23,-1.89 -1,-1, body extent -1.6,-1.28 1.6,1.22, height 0.61

## Part data
C1 C2 C3 C4 C5 C6 C7 C8 C9 C10 C11 C12 C13 C14 C15 C16 C17 C18 C19 C20 C21 C22 C23 C24: library part CAP_0402, "Capacitor SMD 0402"
C25: library part CMP-001-00017-6, "Chip Capacitor, 100 nF, +/- 10%, 50 V, 0603 (1608 Metric)", Capacitor Type=Ceramic, Case/Package=0603, Max Operating Temperature=125°C, Min Operating Temperature=-55°C, Tolerance=10%, Voltage Rating=50V, Mounting Technology=SM, Pins=2, RoHS Compliant=True
C27_Driver1 C27_Driver2 C27_Driver3 C27_Driver4 C27_Driver5 C27_Driver6 C29_Driver1 C29_Driver2 C29_Driver3 C29_Driver4 C29_Driver5 C29_Driver6 C31_Driver1 C31_Driver2 C31_Driver3 C31_Driver4 C31_Driver5 C31_Driver6: library part CMP-2006-04490-1, Manufacturer="AVX Interconnect / Elco", Part Number=0603YC104JAT4A
C28_Driver1 C28_Driver2 C28_Driver3 C28_Driver4 C28_Driver5 C28_Driver6: library part CMP-05427-000077-1, "CAP ALUM 100UF 20% 16V SMD", Capacitance=100uF, Case/Package=Radial, ESR (Equivalent Series Resistance)=360mR, Leakage Current=16uA, Max Operating Temperature=105°C, Min Operating Temperature=-55°C, Package Quantity=1000, Ripple Current=240mA, Tolerance=20%, Voltage=16V, Construction=Cylindrical, Contact Plating=Tin, Diameter=5mm, Height=5.8mm, Height - Seated (Max)=0.24inch, Lead Diameter=0.65mm, Lead Pitch=1.5mm, Length=5.8mm, Life (Hours)=2000Hour, Mount="Surface Mount", Packaging="Tape and Reel", Radiation Hardening=No, REACH SVHC="No SVHC", Ripple Current (AC)=240mA, RoHS Compliant=Yes, Series=FT, Termination=SMD/SMT, Voltage Rating=16V, Voltage Rating (DC)=16V
C30_Driver1 C30_Driver2 C30_Driver3 C30_Driver4 C30_Driver5 C30_Driver6 C32_Driver1 C32_Driver2 C32_Driver3 C32_Driver4 C32_Driver5 C32_Driver6: library part CMP-14477-002410-2, "None", Capacitance=220nF, Case Code (Imperial)=0603, Case Code (Metric)=1608, Dielectric=X7R, Max Operating Temperature=125°C, Min Operating Temperature=-55°C, Package Quantity=4000, Tolerance=10%, Voltage=50V, Case/Package=0603, Construction=Flat, Depth=0.8mm, Halogen Free="Halogen Free", Height=0.8mm, Length=1.6mm, Mount="Surface Mount", Packaging="Tape and Reel", Radiation Hardening=No, RoHS Compliant=Yes, Series=M, Termination=SMD/SMT, Thickness=0.035inch, Voltage Rating=50V, Voltage Rating (DC)=50V, Width=0.8mm
FB1: library part FB_0402, "Ferrite Bead SMD 0402"
J2_Driver1 J2_Driver2 J2_Driver3 J2_Driver4 J2_Driver5 J2_Driver6: library part CMP-17439-000625-1, "CONN HEADER VERT 4POS 1.5MM", Color=Natural, Flammability Rating="UL94 V-0", Max Operating Temperature=85°C, Min Operating Temperature=-25°C, Package Quantity=1664, Voltage Rating=100V, Connector Type=Header, Contact Finish - Mating=TIN, Contact Material="Copper Alloy", Contact Plating=Tin, Contact Shape=Rectangular, Contact Type="Outer Shroud Contact", Fastening Type=Ramp, Gender=Male, Insulation Color=Natural, Insulation Material=Nylon, Mount="Through Hole", Number of Contacts=4, Number of Positions=4, Number of Rows=1, Packaging=Tray, Pitch=0.059inch, Series=ZE, Termination="Kinked Pin"
R1 R2 R3: library part RES_0402, "Resistor SMD 0402"
R6_Driver1 R6_Driver2 R6_Driver3 R6_Driver4 R6_Driver5 R6_Driver6: library part CMP-2003-00783-1, Manufacturer=Panasonic, Part Number=ERJ8BWFR075V
R7_Driver1 R7_Driver2 R7_Driver3 R7_Driver4 R7_Driver5 R7_Driver6: library part CMP-2003-00783-1, Manufacturer=Panasonic, Part Number=ERJ8BWFR075V
R8_Driver1 R8_Driver2 R8_Driver3 R8_Driver4 R8_Driver5 R8_Driver6: library part CMP-08839-020672-1, "Thick Film Chip Resistor, 0603, 25kΩ, 5%, 200ppm/°C, 0.1W, 50V"
R16: library part CMP-1012-00086-1, "3K3 0.1W 5% 0603 (1608 Metric)  SMD", Case-EIA=0603, Case-Metric=1608, Power="0.1 W", Tolerance="5 %", Technology=SMT
U1: library part CMP-020-00024-1, "MCU 32-bit ARM Cortex M4 RISC 1MB Flash 2.5V/3.3V 201-Pin UFBGA T/R", Clock Frequency=26MHz, Frequency=168MHz, Max Operating Temperature=85°C, Max Supply Voltage=3.6V, Min Operating Temperature=-40°C, Min Supply Voltage=1.8V, Interface="CAN, EBI/EMI, Ethernet, I2C, IrDA, LIN, SPI, UART, USART, USB", RAM Size=196kB
U2: library part CMP-09083-000058-1, "IC DGT POT 100KOHM 256TP 24TSSOP", Case/Package=TSSOP, Dual Supply Voltage=2.5V, Max Dual Supply Voltage=2.7V, Max Operating Temperature=85°C, Max Supply Current=12uA, Max Supply Voltage=5.5V, Min Dual Supply Voltage=2.3V, Min Operating Temperature=-40°C, Package Quantity=1000, Resistance=100kR, Resistance Tolerance=30%, Temperature Coefficient=700ppm/°C, -3db Bandwidth=721kHz, Contact Plating=Tin, Interface=SPI, Lead Free="Contains Lead", Memory Type=Volatile, Min Supply Voltage=2.7V, Mount="Surface Mount", Nominal Supply Current=12uA, Number of Circuits=6, Number of Elements=6, Number of Pins=24, Number of Positions=256, Number of Taps=256, Operating Supply Current=12uA, Packaging="Tape and Reel", Quiescent Current=12uA, REACH SVHC="No SVHC", RoHS Compliant=Yes, Series=-, Supply Current=12uA, Taper=Linear, Tolerance=30%
U3_Driver1 U3_Driver2 U3_Driver3 U3_Driver4 U3_Driver5 U3_Driver6: library part CMP-00024-00006-11, "QFN 32 package for stepper driver a4982"
X1: library part TSX-3225_24.0000MF15X-AC, "Crystal SMD 24MHz 10PPM 7pF 3225", Manufacturer=Epson, Manufacturer Part Number="TSX-3225 24.0000MF15X-AC"

## Via types
v1: diameter 11.81, hole 11.81, L1 to L6, 177 vias
v2: diameter 17.72, hole 7.87, L1 to L6, 141 vias
v3: diameter 19.68, hole 7.87, L1 to L6, 66 vias
v4: diameter 27.56, hole 11.81, L1 to L6, 6 vias

## Nets (pads, with @x,y where several pads share a name; then routed paths per layer and width w, separated by ;. In a path a pad name is that pad's centre, name@x,y a point inside that pad or via, vN(x,y) a via of type N, cw(c..) or ccw(c..) an arc to the next point about the centre after c; other vN are vias at no path point)
CP1_Driver1: C29_Driver1.2 U3_Driver1.7 | length 72.5
  L1 w10: C29_Driver1.2@1255,4251.53 1290.31,4251.53 1296.66,4257.88 1323.57,4257.88 U3_Driver1.7@1324.48,4258.79
CP1_Driver2: C29_Driver2.2 U3_Driver2.7 | length 72.5
  L1 w10: C29_Driver2.2@2255,4251.53 2290.31,4251.53 2296.66,4257.88 2323.57,4257.88 U3_Driver2.7@2324.48,4258.79
CP1_Driver3: C29_Driver3.2 U3_Driver3.7 | length 72.5
  L1 w10: C29_Driver3.2@3255,4251.53 3290.31,4251.53 3296.66,4257.88 3323.57,4257.88 U3_Driver3.7@3324.48,4258.79
CP1_Driver4: C29_Driver4.2 U3_Driver4.7 | length 72.5
  L1 w10: C29_Driver4.2@4255,4251.53 4290.31,4251.53 4296.66,4257.88 4323.57,4257.88 U3_Driver4.7@4324.48,4258.79
CP1_Driver5: C29_Driver5.2 U3_Driver5.7 | length 72.5
  L1 w10: C29_Driver5.2@5255,4251.53 5290.31,4251.53 5296.66,4257.88 5323.57,4257.88 U3_Driver5.7@5324.48,4258.79
CP1_Driver6: C29_Driver6.2 U3_Driver6.7 | length 72.5
  L1 w10: C29_Driver6.2@6255,4251.53 6290.31,4251.53 6296.66,4257.88 6323.57,4257.88 U3_Driver6.7@6324.48,4258.79
CP2_Driver1: C29_Driver1.1 U3_Driver1.8 | length 104.7
  L1 w10: C29_Driver1.1@1255,4192.47 1257.39,4194.86 1284.53,4194.86 1284.53,4222 1301.62,4239.09 1324.49,4239.09
CP2_Driver2: C29_Driver2.1 U3_Driver2.8 | length 104.7
  L1 w10: C29_Driver2.1@2255,4192.47 2257.39,4194.86 2284.53,4194.86 2284.53,4222 2301.62,4239.09 2324.48,4239.09
CP2_Driver3: C29_Driver3.1 U3_Driver3.8 | length 104.7
  L1 w10: C29_Driver3.1@3255,4192.47 3257.39,4194.86 3284.53,4194.86 3284.53,4222 3301.62,4239.09 3324.48,4239.09
CP2_Driver4: C29_Driver4.1 U3_Driver4.8 | length 104.7
  L1 w10: C29_Driver4.1@4255,4192.47 4257.39,4194.86 4284.53,4194.86 4284.53,4222 4301.62,4239.09 4324.48,4239.09
CP2_Driver5: C29_Driver5.1 U3_Driver5.8 | length 104.7
  L1 w10: C29_Driver5.1@5255,4192.47 5257.39,4194.86 5284.53,4194.86 5284.53,4222 5301.62,4239.09 5324.48,4239.09
CP2_Driver6: C29_Driver6.1 U3_Driver6.8 | length 104.7
  L1 w10: C29_Driver6.1@6255,4192.47 6257.39,4194.86 6284.53,4194.86 6284.53,4222 6301.62,4239.09 6324.48,4239.09
DIR_1: U1.P8 | length 3821.8
  L1 w4: 4145.67,2917.32 4158.46,2930.12 4158.46,2955.71 U1.P8@4145.67,2968.5
  L1 w6: 1509.52,4298.16 1509.6,4298.08 ; 4132.87,2904.53 4145.67,2917.32
  L1 w8: v2(4107.28,2878.94) 4132.87,2904.53
  L1 w10: 1509.6,4298.08 1537.58,4298.08 1545.52,4306.02 1545.52,4310.39 v2(1547,4311.87)
  L3 w10: v2(1547,4311.87) 1547,4311.01 1563.44,4294.57 1563.44,4287.5 1590,4260.94 1590,4195 1898,3887 3589.21,3887 3790,3686.21 3790,3430 3895,3325 3895,2910 3978.45,2826.55 4099.67,2826.55 4107.28,2834.16 v2(4107.28,2878.94)
DIR_2: U1.B1 | length 2872.5
  L1 w4: 3944.88,3275.59 U1.B1@3966.54,3275.59 ; 4122.71,2917.32 4143.26,2937.88 4143.26,2938.92 4145.67,2941.33 4145.67,2942.91
  L1 w6: 2509.52,4298.16 2509.6,4298.08 ; 3935.04,3275.59 3944.88,3275.59 ; 4102.31,2902.18 4107.57,2902.18 4122.71,2917.32
  L1 w8: v2(3919.29,3275.59) 3935.04,3275.59 ; v2(4081.69,2878.94) 4081.69,2881.57 4102.31,2902.18
  L1 w10: 2509.6,4298.08 2546.92,4298.08 v2(2547,4298)
  L3 w10: v2(2547,4298) 2580,4265 2580,4065 2730,3915 3603.64,3915 3820,3698.64 3820,3440 3940,3320 3940,2888.7 3988.15,2840.55 4075.84,2840.55 4081.69,2846.41 v2@4081.69,2878.44
DIR_3: U1.B3 | length 1306.8
  L1 w4: 4004.92,3322.83 4004.92,3288.39 U1.B3@4017.72,3275.59
  L1 w6: 4004.92,3322.83 4004.92,3339.57
  L1 w8: 4004.92,3339.57 v2(4004.92,3352.36)
  L1 w10: 3509.6,4298.08 3510.58,4299.06 3530.1,4299.06 3542.91,4311.87 v2(3545,4311.87)
  L3 w10: v2(3545,4311.87) 3561.97,4294.9 3561.97,4288.03 3620,4230 3620,3941.07 3850,3711.07 3850,3450 3947.64,3352.36 v2(4004.92,3352.36)
DIR_4: U1.P11 | length 1770.7
  L1 w4: U1.P11@4222.44,2968.5 4235.24,2955.71 4235.24,2930.12 4248.03,2917.32
  L1 w6: 4248.03,2917.32 4260.83,2904.53 ; 4509.52,4298.16 4509.6,4298.08
  L1 w8: 4260.83,2904.53 4273.62,2904.53 v2(4273.62,2878.94)
  L1 w10: 4509.6,4298.08 4537.81,4298.08 4545.52,4305.79 4545.52,4312.46 v2(4547,4313.94)
  L3 w10: v2(4273.62,2878.94) 4597.87,3203.18 4597.87,4287.13 4571.07,4313.94 v2(4547,4313.94)
DIR_5: U1.P10 | length 2416.7
  L1 w4: U1.P10@4196.85,2968.5 4197.9,2967.46 4197.9,2962.1 4209.65,2950.35 4209.65,2917.32
  L1 w6: 4209.65,2917.32 4222.44,2904.53
  L1 w8: v2(4222.44,2853.35) 4222.44,2904.53
  L1 w10: 5509.6,4298.08 5510.58,4299.06 5536.97,4299.06 5542.91,4305 v2(5545,4305)
  L3 w10: v2(4222.44,2853.35) 4258.51,2817.28 4502.08,2817.28 5588.94,3904.14 5588.94,4264.49 5569.42,4284.01 5565.99,4284.01 v2(5545,4305)
DIR_6: U1.P9 | length 3511.3
  L1 w4: U1.P9@4171.26,2968.5 4184.06,2955.71 4184.06,2917.32
  L1 w6: 4184.06,2904.53 4184.06,2917.32 ; 6509.52,4298.16 6509.6,4298.08
  L1 w8: v2(4171.26,2827.76) 4171.26,2891.73 4184.06,2904.53
  L1 w10: 6509.6,4298.08 6546.92,4298.08 v2(6547,4298)
  L3 w10: v2(4171.26,2827.76) 4220.12,2778.89 4503.29,2778.89 5603.46,3879.07 6540.64,3879.07 6598.94,3937.36 6598.94,4267.38 6584.36,4281.95 6564.69,4281.95 6548.64,4298 v2(6547,4298)
DPOT_CLK: U1.P4 U2.8 | length 297.2
  L1 w4: 4196.85,3275.59 4209.65,3288.39 4209.65,3326.77
  L1 w6: 4209.65,3326.77 4209.65,3339.57
  L1 w10: U2.8@4177.39,3554.11 4177.39,3512.57 4209.65,3480.32 4209.65,3339.57
DPOT_CS: U1.P3 U2.5 | length 332.6
  L1 w4: 4145.67,3275.59 4158.47,3288.39 4158.47,3326.77
  L1 w6: 4158.46,3326.77 4158.46,3339.57
  L1 w10: v2(4100,3471.64) 4141.55,3471.64 4158.46,3454.72 4158.46,3339.57 ; v2(4100.34,3516.83) 4100.48,3516.97 4100.48,3553.97 U2.5@4100.61,3554.11
  L3 w10: v2(4100,3471.64) 4100.17,3471.81 4100.17,3516.66 v2(4100.34,3516.83)
DPOT_SDI: U1.R3 U2.7 | length 297.8
  L1 w4: 4171.26,3275.59 4184.06,3288.39 4184.06,3326.77
  L1 w6: U1.R3@4017.3,2942.5 U1.R3@4017.72,2942.91 ; 4184.06,3326.77 4184.06,3339.57
  L1 w10: U2.7@4151.8,3554.11 4151.8,3499.78 4184.06,3467.52 4184.06,3339.57
DPOT_VDD: C25.2 R16.1 U2.6 | length 218.3
  L1 w10: R16.1@3998,3438.5 4046.9,3438.5 C25.2@4047.39,3439 4047.39,3472.7 4068.9,3494.21 4104.7,3494.21 4126.2,3515.72 U2.6@4126.2,3554.11
ENABLE: U1.B12 U3_Driver1.5 U3_Driver2.5 U3_Driver3.5 U3_Driver4.5 U3_Driver5.5 U3_Driver6.5 | length 306.6
  L1 w4: U1.B12@4248.03,3275.59 4260.83,3288.39 4260.83,3326.77
  L1 w6: 4260.83,3326.77 v2(4260.83,3339.57)
  L1 w10: v2(1285,4298) 1285.16,4298.16 U3_Driver1.5@1324.48,4298.16 ; v2(2285,4298) 2285.16,4298.16 U3_Driver2.5@2324.48,4298.16 ; v2(3285,4298) 3285.16,4298.16 U3_Driver3.5@3324.48,4298.16 ; v2(4285,4298) 4285.16,4298.16 U3_Driver4.5@4324.48,4298.16 ; v2(5285,4298) 5285.16,4298.16 U3_Driver5.5@5324.48,4298.16 ; v2(6285,4298) 6285.16,4298.16 U3_Driver6.5@6324.48,4298.16
GND: C1.1 C2.1 C3.1 C4.1 C5.1 C6.1 C7.1 C8.1 C9.1 C10.1 C11.1 C12.1 C13.1 C14.1 C15.1 C16.1 C17.1 C18.1 C19.1 C20.1 C21.1 C22.1 C23.1 C24.1 C25.1 C27_Driver1.2 C27_Driver2.2 C27_Driver3.2 C27_Driver4.2 C27_Driver5.2 C27_Driver6.2 C28_Driver1.1 C28_Driver2.1 C28_Driver3.1 C28_Driver4.1 C28_Driver5.1 C28_Driver6.1 C30_Driver1.2 C30_Driver2.2 C30_Driver3.2 C30_Driver4.2 C30_Driver5.2 C30_Driver6.2 C32_Driver1.2 C32_Driver2.2 C32_Driver3.2 C32_Driver4.2 C32_Driver5.2 C32_Driver6.2 R3.2 R6_Driver1.1 R6_Driver2.1 R6_Driver3.1 R6_Driver4.1 R6_Driver5.1 R6_Driver6.1 R7_Driver1.1 R7_Driver2.1 R7_Driver3.1 R7_Driver4.1 R7_Driver5.1 R7_Driver6.1 R8_Driver1.2 R8_Driver2.2 R8_Driver3.2 R8_Driver4.2 R8_Driver5.2 R8_Driver6.2 U1.D5 U1.D7 U1.D8 U1.D9 U1.F2 U1.F6 U1.F7 U1.F8 U1.F9 U1.F10 U1.F12 U1.G2 U1.G6 U1.G7 U1.G8 U1.G9 U1.G10 U1.G12 U1.H6 U1.H7 U1.H8 U1.H9 U1.H10 U1.H12 U1.J6 U1.J7 U1.J8 U1.J9 U1.J10 U1.K6 U1.K7 U1.K8 U1.K9 U1.K10 U1.M1 U1.M8 U1.M9 U1.N1 U2.3 U2.4 U2.9 U2.10 U2.13 U2.16 U2.21 U2.24 U3_Driver1.6 U3_Driver1.19 U3_Driver2.6 U3_Driver2.19 U3_Driver3.6 U3_Driver3.19 U3_Driver4.6 U3_Driver4.19 U3_Driver5.6 U3_Driver5.19 U3_Driver6.6 U3_Driver6.19 X1.2 X1.4 | length 5591.2
  L1 w10: v2@1269.47,4278.47 U3_Driver1.19@1508.89,4278.47 1509.36,4278.94 1668.57,4278.94 1669.03,4278.47 ; v2@2269.47,4278.47 2669.03,4278.47 ; v2@3269.47,4278.47 U3_Driver3.19@3508.89,4278.47 3509.36,4278.94 3668.57,4278.94 3669.03,4278.47 ; C20.1@3644,3161.68 3720.72,3161.68 X1.4@3720.72,3182.4 ; v2@4269.47,4278.47 U3_Driver4.6@4323.86,4278.47 4669.03,4278.47 ; v2@5269.47,4278.47 5669.03,4278.47 ; v2@6269.47,4278.47 6669.03,4278.47
  L2 w20: v1(1317,4528) 1397,4448 1397,4348 ; 1437,4348 1437,4448 v1(1517,4528) ; v1(2317,4528) 2397,4448 2397,4348 ; 2437,4348 2437,4448 v1(2517,4528) ; v1(3317,4528) 3397,4448 3397,4348 ; 3437,4348 3437,4448 v1(3517,4528) ; v1(4317,4528) 4397,4448 4397,4348 ; 4437,4348 4437,4448 v1(4517,4528) ; v1(5317,4528) 5397,4448 5397,4348 ; 5437,4348 5437,4448 v1(5517,4528) ; v1(6317,4528) 6397,4448 6397,4348 ; 6437,4348 6437,4448 v1(6517,4528)
  L6 w10: C19.1@3926.32,2919 3926.32,2949.06 3915.35,2960.02 3915.35,2985.35 3929.17,2999.17 3940.63,2999.17 3948.38,3006.92 C1.1@3980.01,3006.92 ; C24.1@3951.57,3141.73 3952.44,3140.87 3983.45,3140.87 C13.1@3984.32,3140 ; C6.1@3963,3208.32 3964.97,3208.32 3971.78,3201.5 3971.78,3195.5 3985.32,3181.97 C17.1@3985.32,3180 ; v2(3966.54,3019.68) 3968.01,3021.16 3968.01,3040.85 C3.1@3972.44,3045.28 ; v2(4196.85,3147.64) 4197.53,3148.32 4247.35,3148.32 v2(4248.03,3147.64) ; v2(4196.85,3173.23) 4213.62,3190 C22.1@4242.31,3190 ; C23.1@4209,3065.68 4213.25,3065.68 4217.78,3061.16 4237.78,3061.16 4247.94,3051 C12.1@4279,3051 4302,3051 4348.15,3097.15 C10.1@4348.15,3121.98
  other v1: 4096.61,3439 4050,3540 4075,3540 4202.98,3554.11 4228.57,3554.11 3998.25,3773.89 4075.02,3773.89 4202.98,3773.89 4279.75,3773.89 1675,4145 1815,4145 1860,4145 3680,4145 3815,4145 3860,4145 2687,4158 2817,4158 6687,4158 6817,4158 2860,4159 6860,4159 4685,4160 4815,4160 4860,4160 5690,4160 5815,4160 5860,4160 3682,4194 3817,4194 3860,4194.09 1127,4198 1187,4198 2127,4198 2187,4198 3127,4198 3187,4198 5127,4198 5187,4198 6127,4198 6187,4198 4127,4199.91 4187,4199.91 1817,4203 2817,4203 6817,4203 1860,4204 2860,4204 6860,4204 4685,4205 4815,4205 4860,4205 5815,4205 5860,4205 2687,4208 6687,4208 5690,4210 1699.28,4220.28 5690,4245 5815,4245 5860,4245 1127,4248 1187,4248 1817,4248 2127,4248 2187,4248 2817,4248 3127,4248 3187,4248 3682,4248 3817,4248 4127,4248 4187,4248 4817,4248 5127,4248 5187,4248 6127,4248 6187,4248 6817,4248 1687,4249.09 1860,4249 2860,4249 3860,4249 4860,4249 6860,4249 4685,4250 2687,4258 6687,4258 1157,4528 2157,4528 3157,4528 4157,4528 5157,4528 6157,4528 1157,4578 2157,4578 3157,4578 4157,4578 5157,4578 6157,4578 1157,4628 2157,4628 3157,4628 4157,4628 5157,4628 6157,4628
  other v2: 3966.54,2994.09 4145.67,3019.68 4171.26,3019.68 4094.49,3070.87 4120.08,3070.87 4145.67,3070.87 4171.26,3070.87 4196.85,3070.87 4094.49,3096.46 4120.08,3096.46 4145.67,3096.46 4171.26,3096.46 4196.85,3096.46 4094.49,3122.05 4120.08,3122.05 4145.67,3122.05 4171.26,3122.05 4196.85,3122.05 4248.03,3124.17 3992.13,3147.64 4094.49,3147.64 4120.08,3147.64 4145.67,3147.64 4171.26,3147.64 4094.67,3172.44 3992.13,3173.23 4120.08,3173.23 4145.67,3173.23 4171.26,3173.23 4248.03,3173.23 4068.9,3224.41 4120.08,3224.41 4145.67,3224.41 4171.26,3224.41 1270,4278 2270,4278 3270,4278 4270,4278 5270,4278 6270,4278
  other v4: 1365,4066.8 2365,4066.8 3365,4066.8 4368.78,4066.8 5365,4066.8 6365,4066.8
MCU_BOOT0: R3.1 U1.D6 | length 101.1
  L1 w3.5: v2(4062.16,3173.23) 4094.49,3205.55 U1.D6@4094.49,3224.41
  L6 w6: R3.1@4061.81,3178.94 R3.1@4062.01,3179.13 ; v2(4062.16,3173.23) 4083.58,3194.65 4089.55,3194.65
MCU_NRST: C24.2 R2.2 U1.J1 | length 38.9
  L6 w10: C24.2@3951.57,3102.36 3956.38,3097.56 3965.44,3097.56 v2(3966.54,3096.46) 3967.64,3097.56 3979.87,3097.56 R2.2@3985.31,3103
MCU_OSC_IN: C21.2 U1.G1 X1.3 | length 190
  L1 w6: 3936.61,3147.64 U1.G1@3966.54,3147.64
  L1 w8: C21.2@3919.35,3165.11 3919.35,3147.64 3936.61,3147.64
  L1 w10: X1.3@3811.28,3182.4 3811.28,3165.11 C21.2@3919.35,3165.11
MCU_OSC_OUT: R1.2 U1.H1 | length 58.8
  L1 w6: 3936.61,3122.05 U1.H1@3966.54,3122.05
  L1 w8: R1.2@3909.45,3120.36 3909.45,3122.05 3936.61,3122.05
MCU_VCAP1: C23.2 U1.M10
  other v2: 4196.85,3019.68
MCU_VCAP2: C22.2 U1.F13
  other v2: 4273.62,3173.23
MCU_VDDA: C19.2 FB1.2 U1.R1 | length 94.4
  L6 w10: v2(3966.54,2942.91) 3966.11,2942.49 3966.11,2919.43 C19.2@3965.69,2919 3965.69,2920.97 3972.5,2927.78 3974.46,2927.78 3994.36,2947.68 3996.73,2947.68 3998.21,2949.16 4014.3,2949.16 FB1.2@4019.86,2954.72
MCU_VREF+: C1.2 C2.2 U1.P1 | length 45.5
  L6 w10: C2.2@3947,2961.31 3953.09,2967.4 3965.44,2967.4 v2(3966.54,2968.5) 3967.64,2967.4 3981.91,2967.4 C1.2@3987,2962.31
MS1: U3_Driver1.11 U3_Driver2.11 U3_Driver3.11 U3_Driver4.11 U3_Driver5.11 U3_Driver6.11 | length 7352.8
  L1 w4: 4324.8,3275.59 4350.39,3275.59
  L1 w6: 4350.39,3275.59 4363.19,3275.59
  L1 w8: v2(1387,4168) v2@1387.24,4168.24 ; U3_Driver1.11@1387.24,4215.24 U3_Driver1.11@1387.47,4215.48 ; v2(2387,4168) v2@2387.24,4168.24 ; U3_Driver2.11@2387.24,4215.24 U3_Driver2.11@2387.47,4215.48 ; v2(3387,4168) v2@3387.24,4168.24 ; U3_Driver3.11@3387.24,4215.24 U3_Driver3.11@3387.47,4215.48 ; 4363.19,3275.59 4388.78,3275.59 v2(4389.37,3276.18) ; U3_Driver4.11@4387.24,4215.24 U3_Driver4.11@4387.47,4215.48 ; v2(5387,4168) v2@5387.24,4168.24 ; U3_Driver5.11@5387.24,4215.24 U3_Driver5.11@5387.47,4215.48 ; v2(6387,4168) v2@6387.24,4168.24 ; U3_Driver6.11@6387.24,4215.24 U3_Driver6.11@6387.47,4215.48
  L1 w10: U3_Driver1.11@1386.07,4202.37 U3_Driver1.11@1386.85,4203.15 ; v2@1387.24,4168.24 U3_Driver1.11@1387.24,4215.24 ; U3_Driver2.11@2385.94,4213.95 2387.24,4215.24 v2@2387.24,4168.24 ; v2@3387.24,4168.24 U3_Driver3.11@3387.24,4215.24 ; U3_Driver4.11@4386.06,4214.07 4387.24,4215.24 v2@4387.24,4168.24 ; v2@5387.24,4168.24 5386.06,4169.41 5386.06,4214.07 U3_Driver5.11@5387.24,4215.24 ; v2@6387.24,4168.24 U3_Driver6.11@6387.24,4215.24
  L3 w8: v2@1387,4165.37 v2(1387,4168) ; v2@2387,4165.37 v2(2387,4168) ; v2@3387,4165.37 v2(3387,4168) ; v2@5387,4165.37 v2(5387,4168) ; v2@6387,4165.37 v2(6387,4168)
  L3 w10: v2(3387,4168) 3390,4165 3500,4165 v2(3555,4110) ; v2(4387,4168) 4325,4106 4325,3339.37 4388.19,3276.18 v2(4389.37,3276.18)
  L4 w10: v2(1387,4168) 1426.22,4168 1537.16,4278.94 2191.07,4278.94 2290,4180 2372.91,4180 2384.91,4168 v2(2387,4168) ; v2(3387,4168) 3421.22,4168 3532.16,4278.94 3565.51,4278.94 3568.58,4282 4208,4282 4322,4168 v2(4387,4168) 4436.88,4168 4548.88,4280 5210,4280 5322,4168 v2(5387,4168) 5446.22,4168 5537.16,4258.94 5545.51,4258.94 5568.58,4282 6208,4282 6322,4168 v2(6387,4168) ; v2(3555,4110) 3935,4110 4174.09,3870.91 4174.09,3495.91 4195,3475 4195,3350 4269.41,3275.59 4388.78,3275.59 v2(4389.37,3276.18)
MS1_XY: U1.K2 | length 3961
  L1 w4: 3940.94,3058.07 3979.33,3058.07 U1.K2@3992.13,3070.87
  L1 w6: 3928.15,3045.28 3940.94,3058.07
  L1 w8: v2(3915.35,3045.28) 3928.15,3045.28
  L4 w10: 1410,4400 3203.55,4400 3209.41,4394.14 3209.41,4085.79 3575.2,3720 4033.12,3720 4050,3703.12 4050,3594.8 3855,3399.8 3855,3104.44 3914.17,3045.28 v2(3915.35,3045.28)
MS1_ZE: U1.B15
MS2: U3_Driver1.12 U3_Driver2.12 U3_Driver3.12 U3_Driver4.12 U3_Driver5.12 U3_Driver6.12 | length 7354.2
  L1 w4: 4324.8,3250 4350.39,3250
  L1 w6: 4350.39,3250 4363.19,3250
  L1 w8: v2(1407,4188) v2@1407.08,4188.08 ; U3_Driver1.12@1407.08,4215.4 U3_Driver1.12@1407.16,4215.48 ; v2(2407,4188) v2@2407.08,4188.08 ; U3_Driver2.12@2407.08,4215.4 U3_Driver2.12@2407.16,4215.48 ; v2(3407,4188) v2@3407.08,4188.08 ; U3_Driver3.12@3407.08,4215.4 U3_Driver3.12@3407.16,4215.48 ; 4363.19,3250 v2(4388.78,3250) ; U3_Driver4.12@4407.08,4215.4 U3_Driver4.12@4407.16,4215.48 ; v2(6407,4188) v2@6407.08,4188.08 ; U3_Driver6.12@6407.08,4215.4 U3_Driver6.12@6407.16,4215.48
  L1 w10: U3_Driver1.12@1405.77,4214.09 U3_Driver1.12@1406.53,4214.86 ; v2@1407.08,4188.08 U3_Driver1.12@1407.08,4215.4 ; v2@2407.08,4188.08 U3_Driver2.12@2407.08,4215.4 ; v2@3407.08,4188.08 U3_Driver3.12@3407.08,4215.4 ; U3_Driver4.12@4405.77,4214.09 4407.08,4215.4 v2@4407.08,4188.08 ; v2(5405,4190) 5405.77,4190.77 5405.77,4214.09 U3_Driver5.12@5407.08,4215.4 ; v2@6407.08,4188.08 U3_Driver6.12@6407.08,4215.4
  L3 w8: v2@1405.52,4186.52 v2(1407,4188) ; v2@2405.52,4186.52 v2(2407,4188) ; v2@6405.52,4186.52 v2(6407,4188)
  L3 w10: v2(3407,4188) 3370.86,4188 3365,4182.14 3365,4149.79 3370.86,4143.94 3494.29,4143.94 3553.81,4084.41 v2(3555,4084.41) ; v2(4388.78,3250) 4389.97,3250 4408.31,3268.34 4408.31,3284.03 4345,3347.34 4345,4099.22 4405.93,4160.16 4405.93,4184.07 v2@4405,4185
  L4 w10: v2(1407,4188) 1426.42,4188 1531.36,4292.94 2197.07,4292.94 2295,4195 2397.91,4195 2404.91,4188 v2(2407,4188) ; v2@3405.52,4189.48 3413.93,4189.48 3414.46,4190 3423.42,4190 3526.36,4292.94 3559.71,4292.94 3563.78,4297 4218,4297 4327,4188 v2(4407,4188) 4437.08,4188 4544.08,4295 5220,4295 5325,4190 v2(5405,4190) 5448.42,4190 5531.36,4272.94 5539.71,4272.94 5563.78,4297 6218,4297 6327,4188 v2(6407,4188) ; v2(3555,4084.41) 3924.4,4084.41 4155,3853.81 4155,3484.97 4175,3464.97 4175,3333.81 4258.81,3250 v2(4388.78,3250)
MS2_XY: U1.K1 | length 3904.9
  L1 w4: 3940.94,3070.87 U1.K1@3966.54,3070.87
  L1 w6: 3928.15,3070.87 3940.94,3070.87
  L1 w8: v2(3915.35,3070.87) 3928.15,3070.87
  L4 w10: 1421.02,4414 3209.35,4414 3225,4398.35 3225,4090 3579.41,3735.59 4037.33,3735.59 4065,3707.92 4065,3590 3870,3395 3870,3116.22 v2(3915.35,3070.87)
MS2_ZE: U1.C15
NetU3_Driver1_17: U3_Driver1.17
NetU3_Driver1_18: U3_Driver1.18
NetU3_Driver1_20: U3_Driver1.20
NetU3_Driver2_17: U3_Driver2.17 | length 2074.6
  L1 w10: U3_Driver2.17@2508.9,4239.09 2528.82,4239.09 2542.91,4225 v2(2545,4225)
  L3 w10: v2(2545,4225) 2545,4075 2719,3901 3596.43,3901 3805,3692.43 3805,3435 3919.29,3320.71 3919.29,3275.59
NetU3_Driver2_18: U3_Driver2.18
NetU3_Driver2_20: U3_Driver2.20
NetU3_Driver3_17: U3_Driver3.17
NetU3_Driver3_18: U3_Driver3.18
NetU3_Driver3_20: U3_Driver3.20
NetU3_Driver4_17: U3_Driver4.17
NetU3_Driver4_18: U3_Driver4.18
NetU3_Driver4_20: U3_Driver4.20
NetU3_Driver5_17: U3_Driver5.17
NetU3_Driver5_18: U3_Driver5.18
NetU3_Driver5_20: U3_Driver5.20
NetU3_Driver6_17: U3_Driver6.17
NetU3_Driver6_18: U3_Driver6.18
NetU3_Driver6_20: U3_Driver6.20